# Altium PCB PCB-Thermostat.PcbDoc (part 1 of 4)
Units mil, origin at the board's own origin, x right, y up, seen from the top; angles counter-clockwise.
Board outline 3937.01 x 3543.31 mil, 4 copper layers (Top, PWR, GND, Bottom), stack 62.417 mil thick; 123 components, 131 nets, 527 pads, 279 vias.
Unrouted connection lines stored in the file: 2.
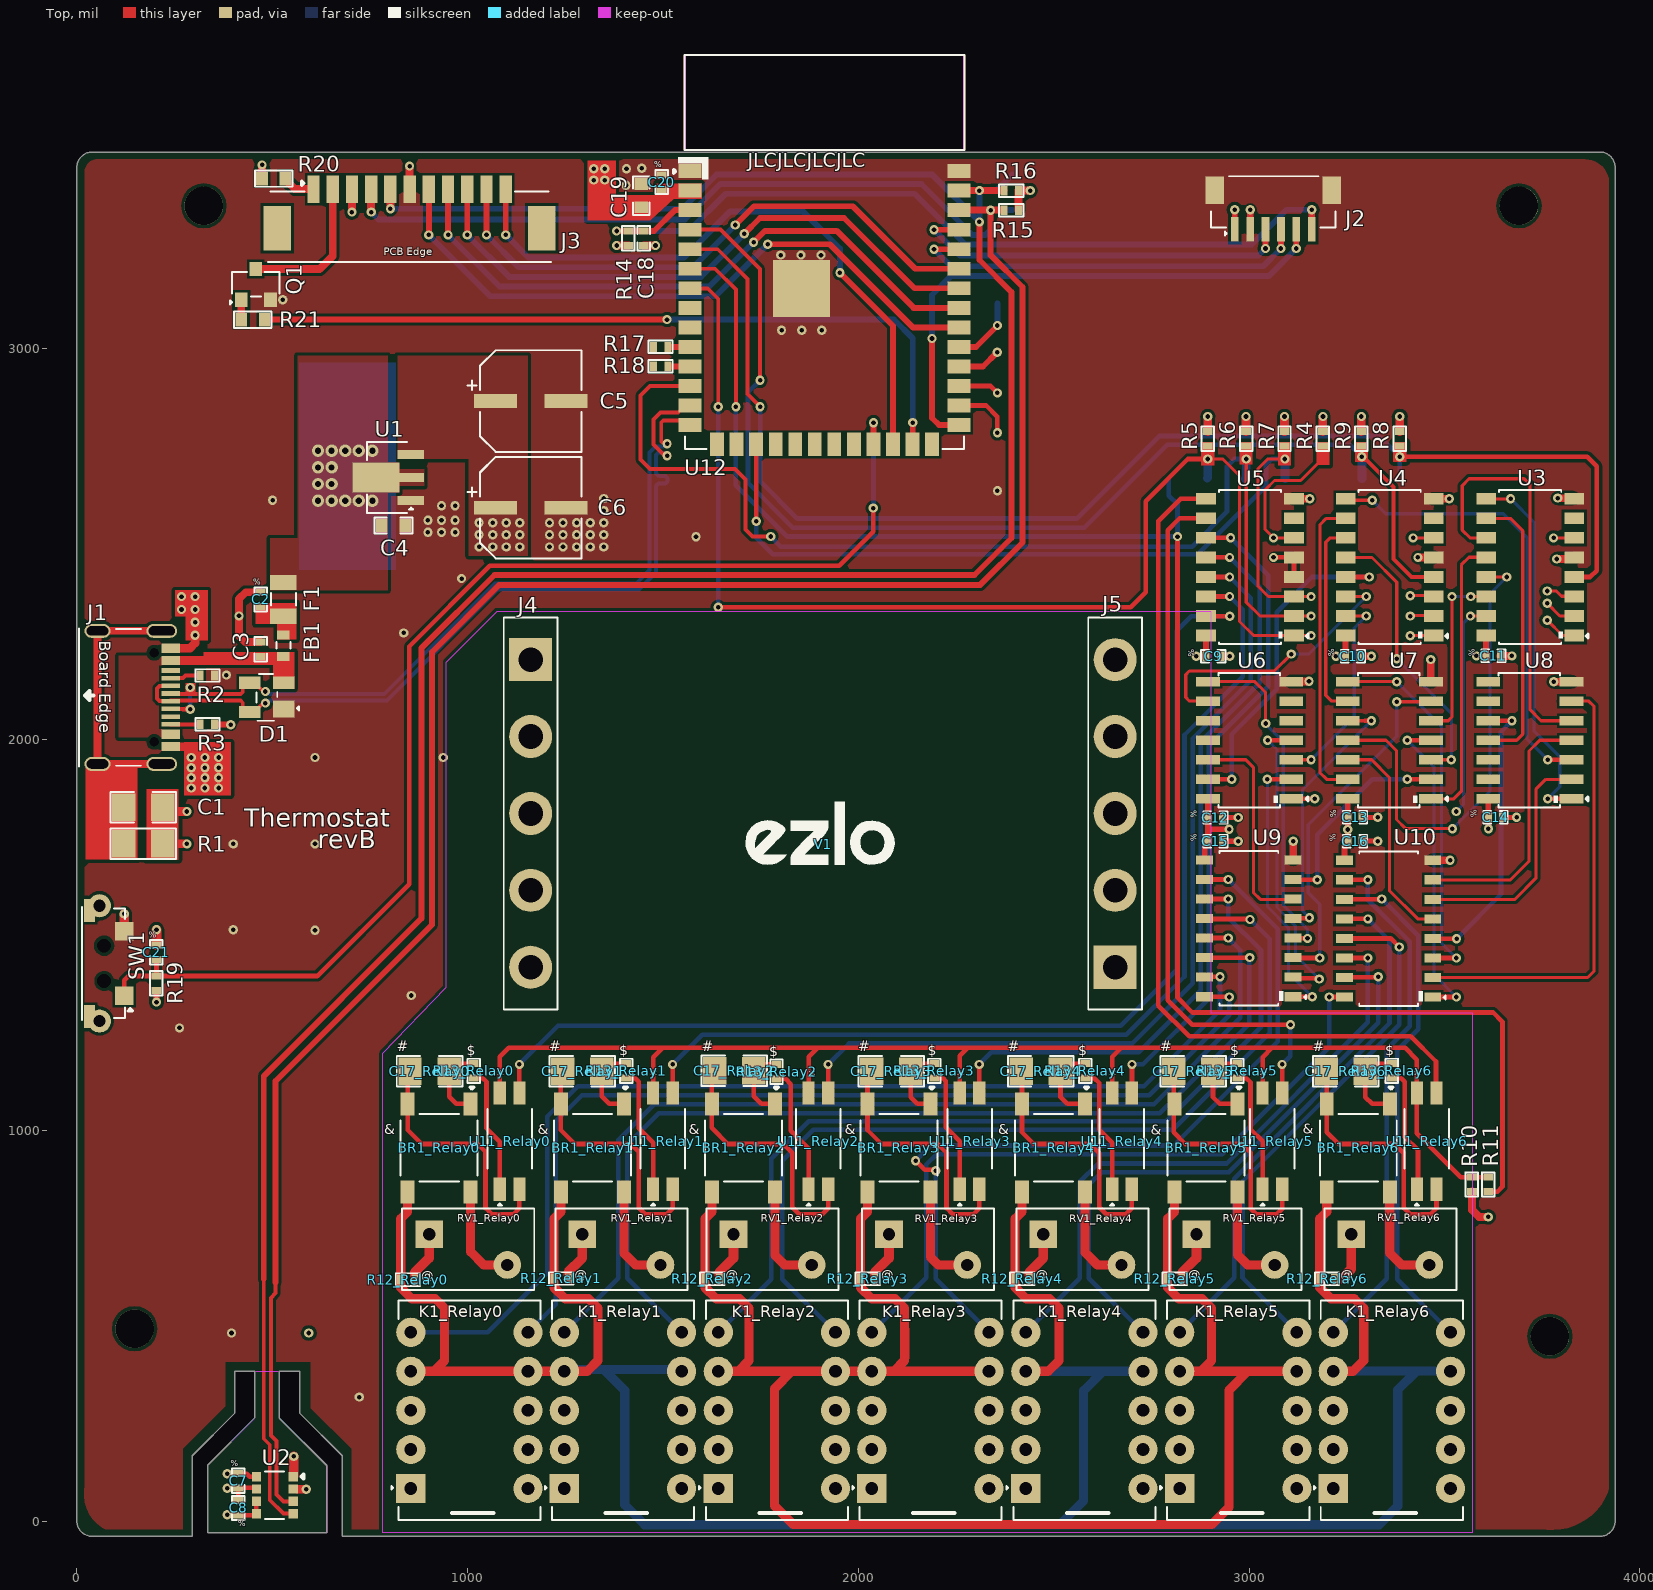
[diagram p0: Top view]
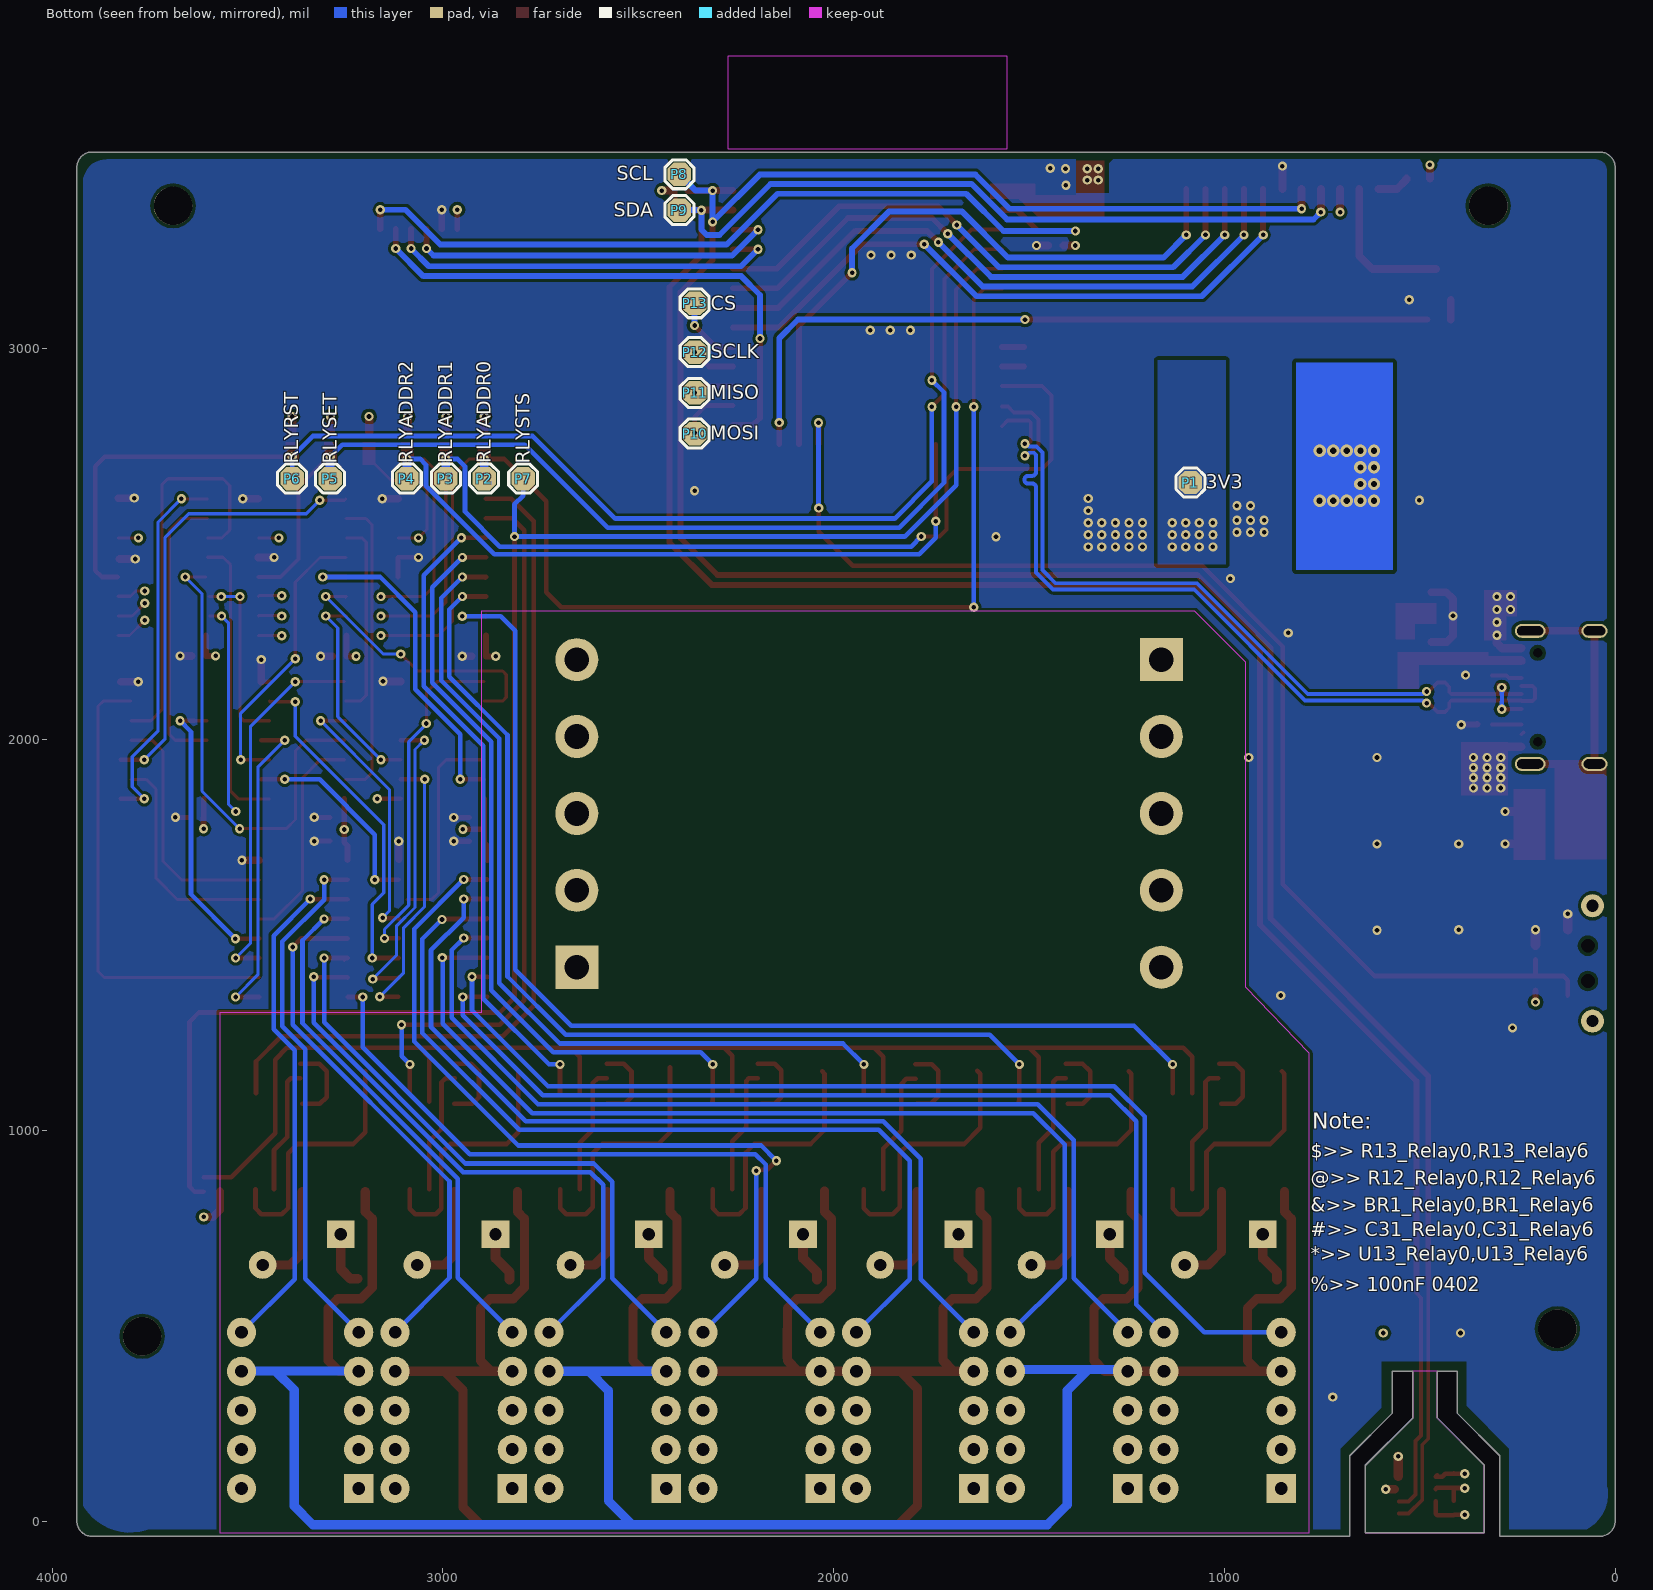
[diagram p1: Bottom view, seen from below]
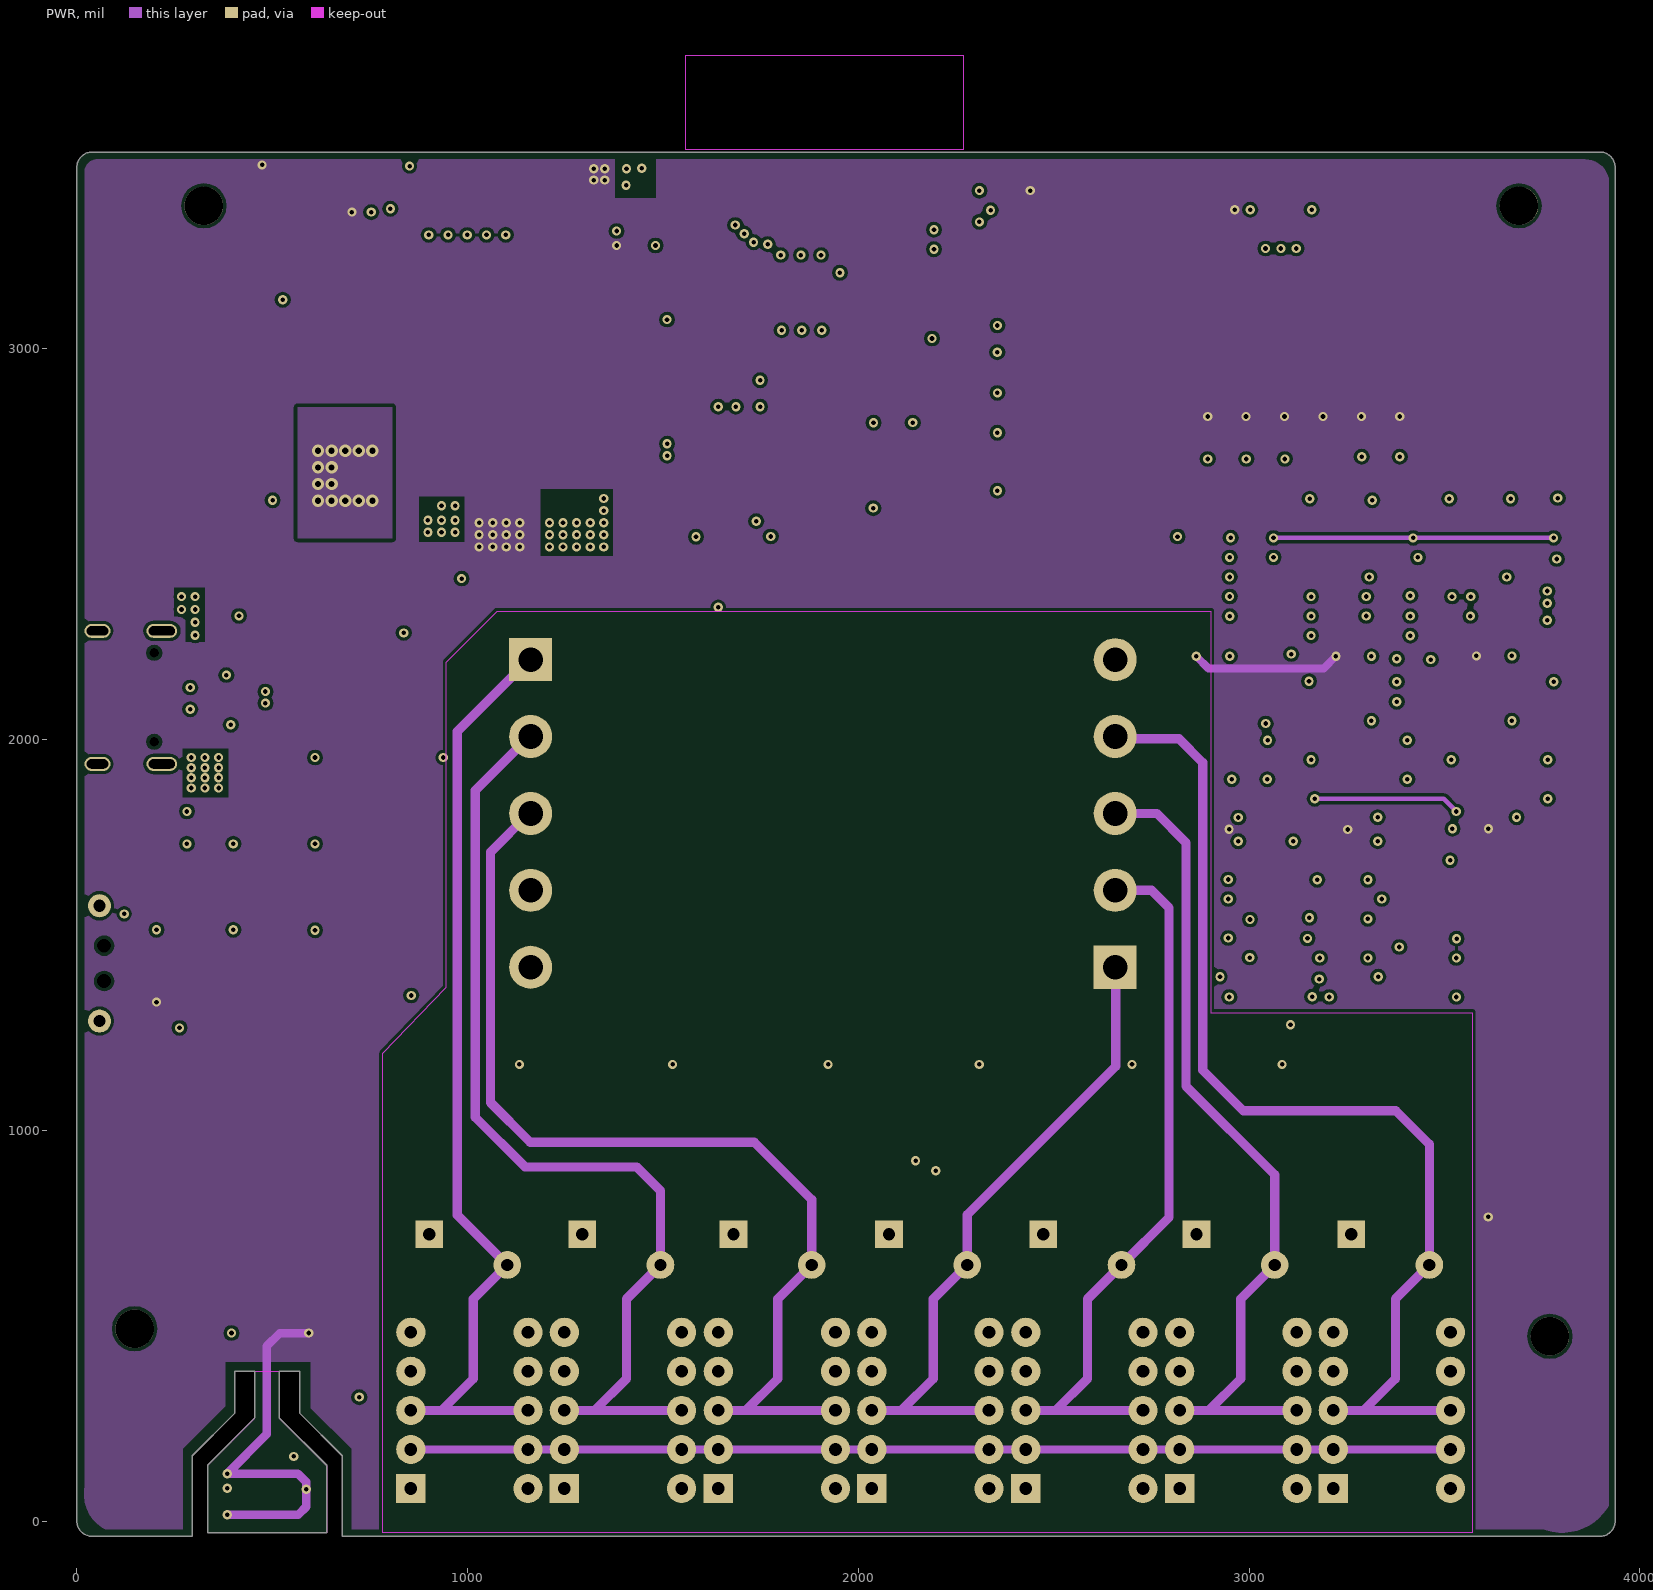
[diagram p2: PWR]
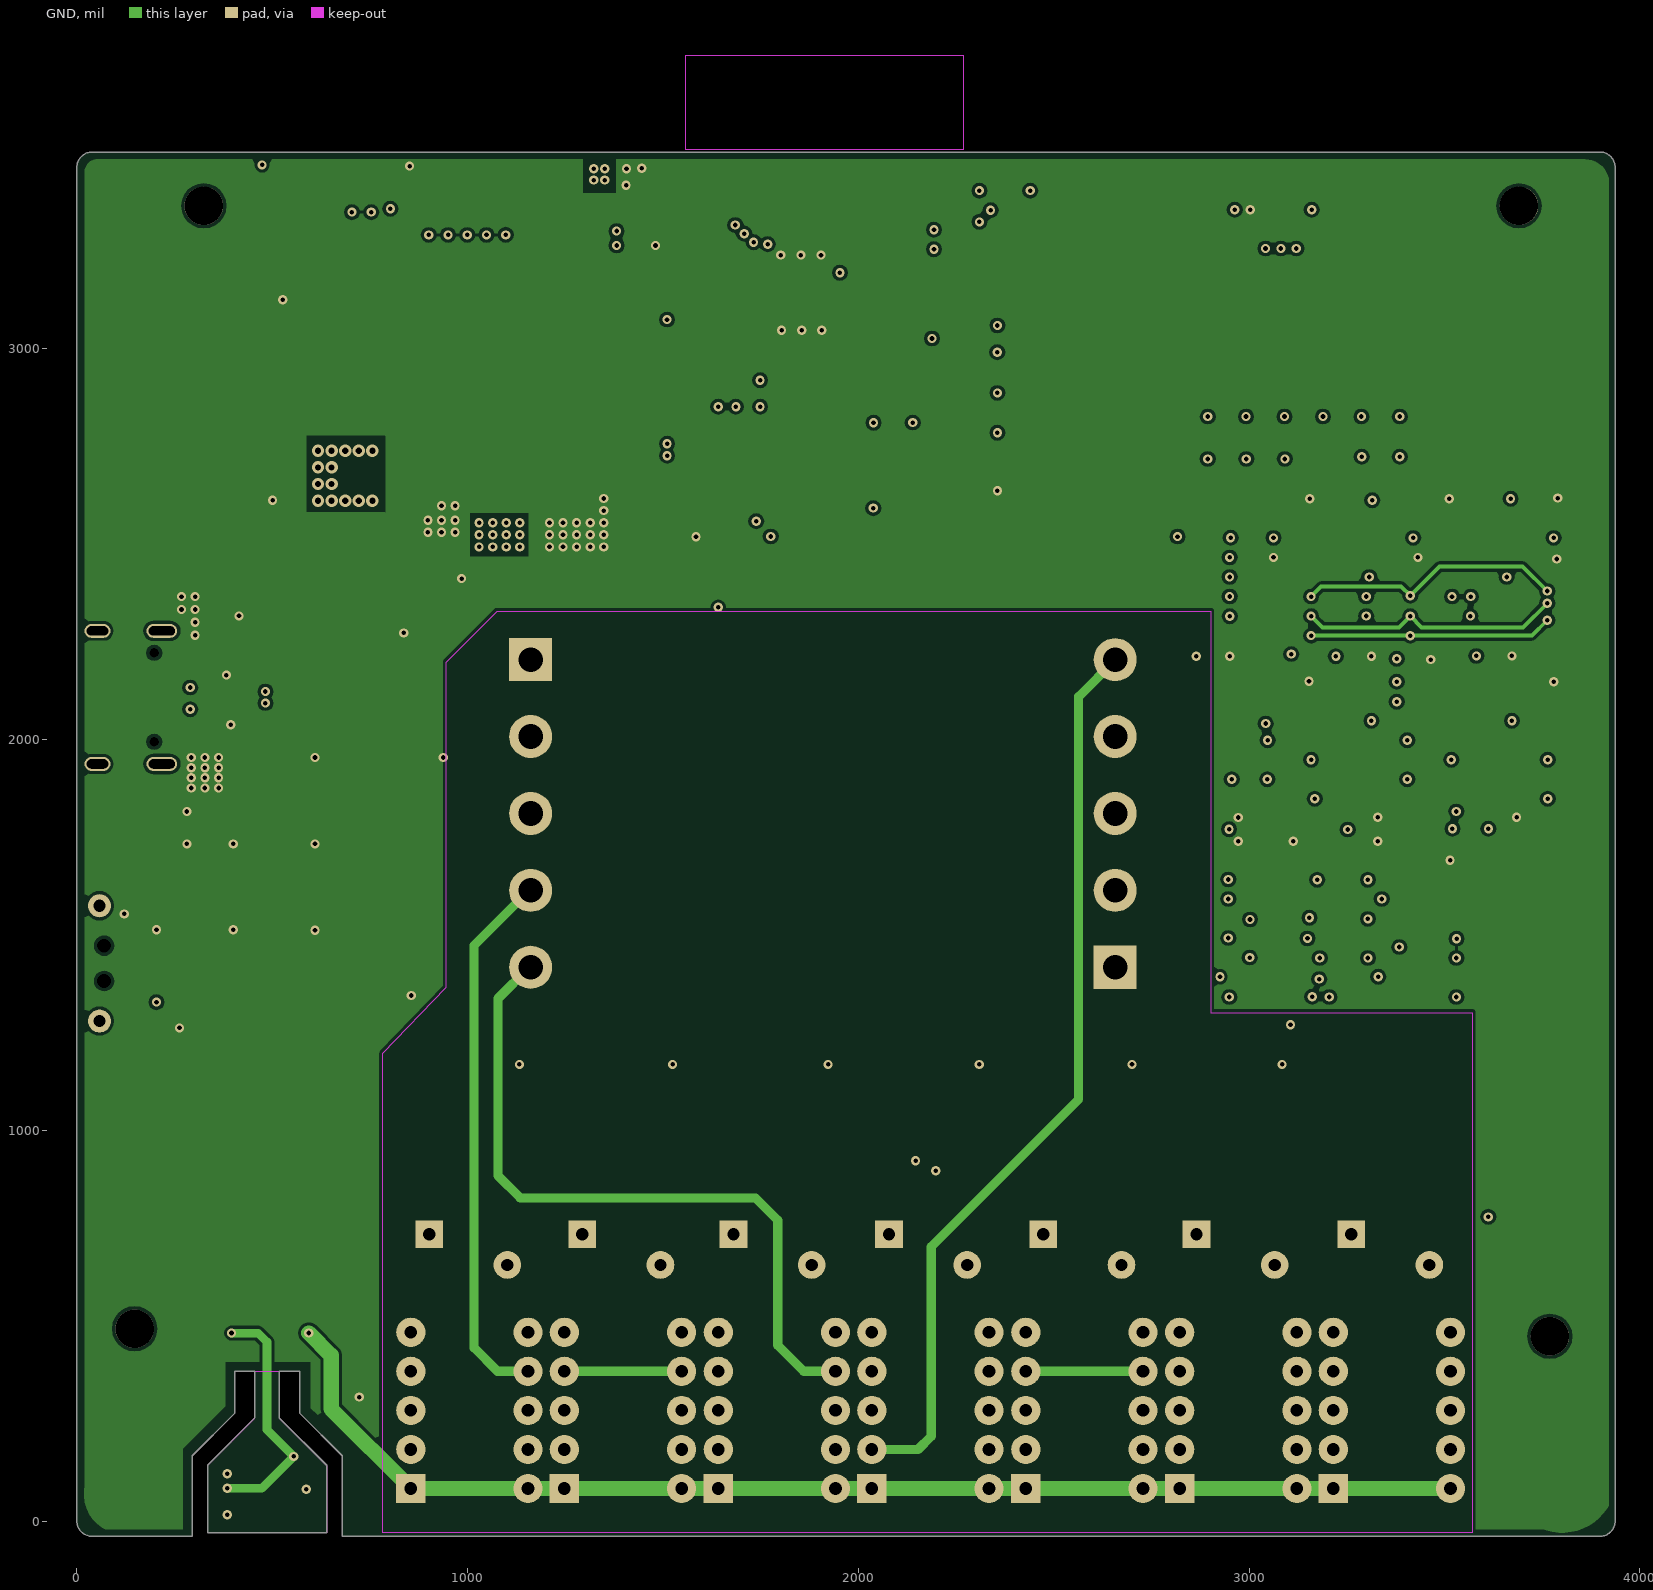
[diagram p3: GND]
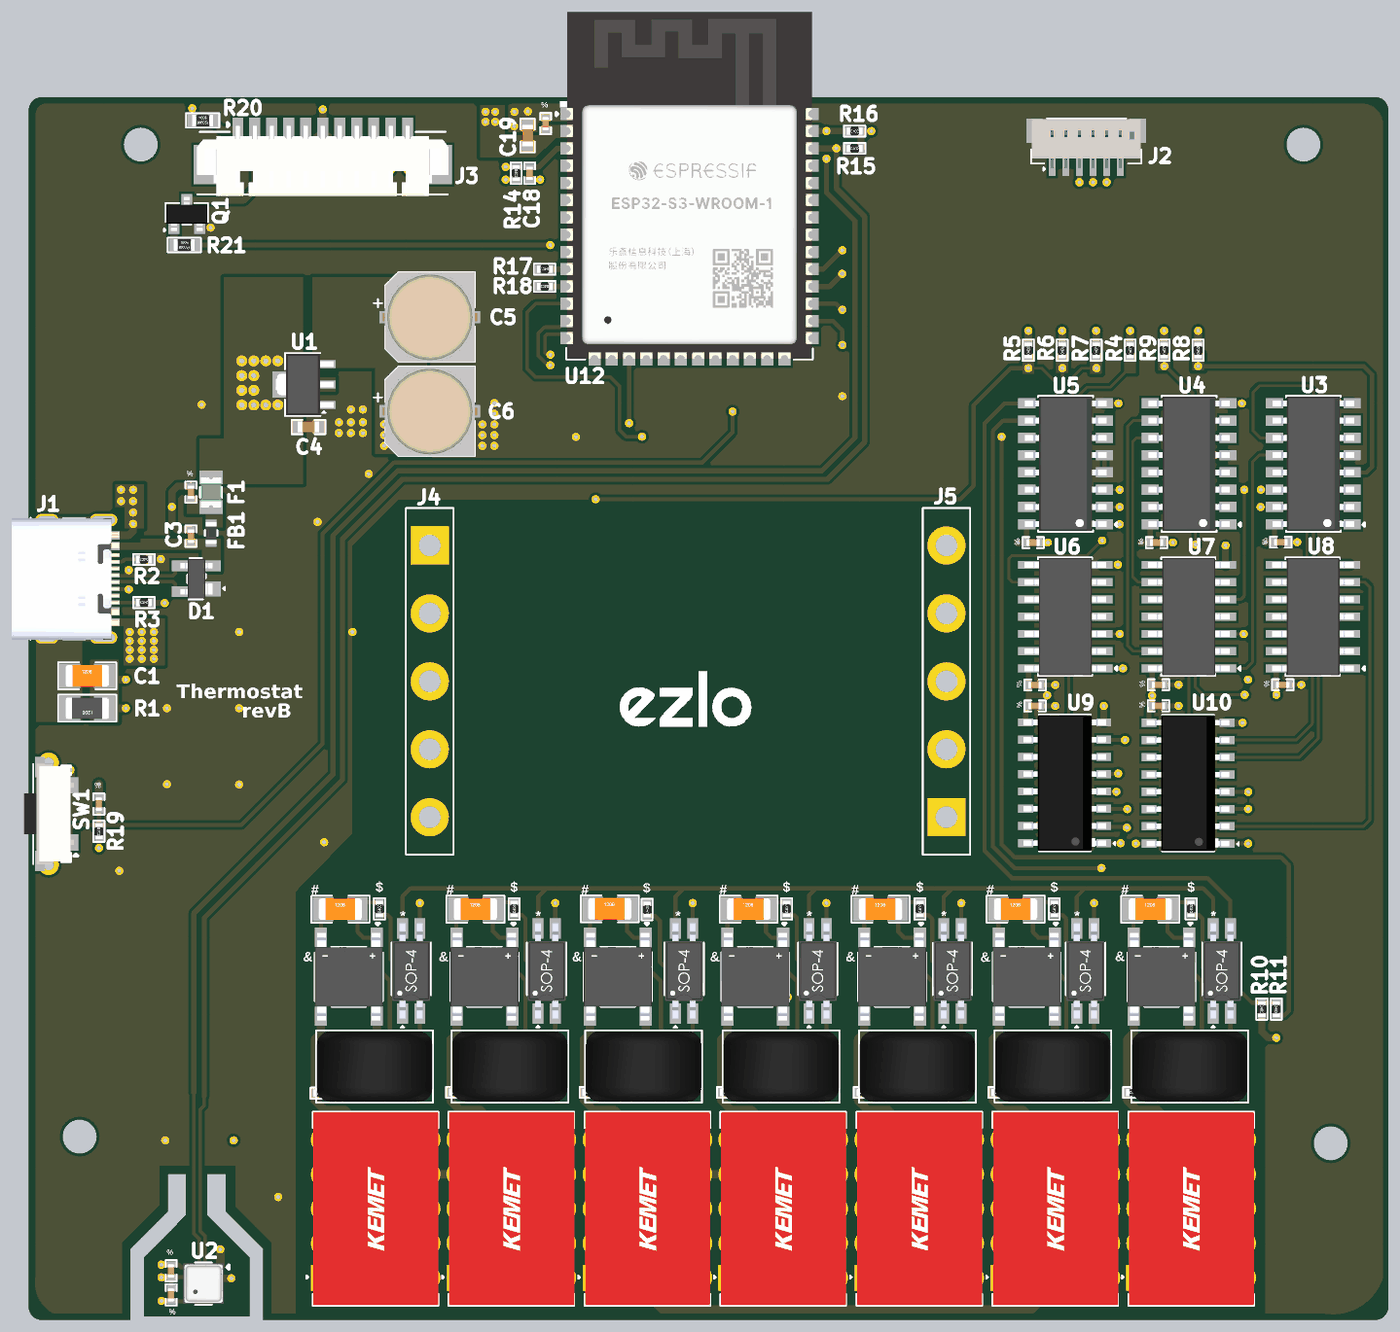
[diagram p6: 3D render of the assembled board from above, using the file's embedded part models]

## Layer stack, top to bottom
Top Solder: solder mask 0.3937, Solder Resist, Dk 3.3
Top: signal copper 1.378
Dielectric 4: core 8.2677, PP-006, Dk 4.6
PWR: signal copper 0.5984
Dielectric 1: prepreg 41.929, FR-4, Dk 4.6
GND: signal copper 0.5984
Dielectric 5: core 8.2677, PP-006, Dk 4.6
Bottom: signal copper 1.378
Bottom Solder: solder mask 0.3937, Solder Resist, Dk 3.3

## Board outline
0,0 ccw(c39.37,0) 39.37,-39.37 295.28,-39.37 295.28,167.32 403.54,275.59 403.54,383.86 454.72,383.86 454.72,263.78 334.65,142.72 334.65,-29.53 639.76,-29.53 639.76,142.72 517.72,263.78 517.72,383.86 570.87,383.86 570.87,275.59 679.13,167.32 679.13,-39.37 3897.64,-39.37 ccw(c3897.64,0) 3937.01,0 3937.01,3464.57 ccw(c3897.64,3464.57) 3897.64,3503.94 39.37,3503.94 ccw(c39.37,3464.57) 0,3464.57

## Design rules (kind name [scope] priority, off if disabled: settings)
Clearance [All] p1: gap=6 ignorepadtopadclearanceinfootprint=FALSE except(4: Arc-SMDPad Track-SMDPad SMDPad-SMDPad; 7: SMDPad-Fill SMDPad-Poly SMDPad-Region; 8: Arc-Fill Arc-Poly Arc-Region Track-Fill Track-Poly Track-Region THPad-Fill THPad-Poly THPad-Region Via-Fill Via-Poly Via-Region; 9.5: Fill-Fill Fill-Poly Fill-Region Poly-Poly Poly-Region Region-Region)
DiffPairsRouting [InDifferentialPairClass('USB_Lines')] p1: maxlimit=20 minlimit=6 mostfreqgap=20 toplayer_maxgap=6 toplayer_prefgap=6 toplayer_minwidth=10 toplayer_maxwidth=10 toplayer_prefwidth=10 midlayer1_mingap=20 midlayer1_minwidth=11 midlayer1_maxwidth=11 midlayer1_prefwidth=11 midlayer2_mingap=20 midlayer2_minwidth=11 midlayer2_maxwidth=11 midlayer2_prefwidth=11 bottomlayer_maxgap=6 bottomlayer_prefgap=6 bottomlayer_minwidth=10 bottomlayer_maxwidth=10 bottomlayer_prefwidth=10 impedanceprofiledriven=TRUE impedanceprofileid={9FB7C108-1303-4D36-9296-57A6E4422DFF} impedanceprofilevalue=90.000000 maxuncoupledlength=520
HoleSize [All] p1: absolutevalues=TRUE maxlimit=1000 minlimit=1 maxpercent=80.000 minpercent=20.000
HoleToHoleClearance [All] p1: gap=0 allowstackedmicrovias=TRUE
MatchedLengths "Schematic Matched Net Lengths" [InNetClass('USB')] p1: tolerance=50 checknetsindiffpair=TRUE checkdiffpairvsdiffpair=FALSE checkxsignals=FALSE checkothers=FALSE
MatchedLengths [InDifferentialPairClass('USB_Lines')] p2: tolerance=20 checknetsindiffpair=TRUE checkdiffpairvsdiffpair=FALSE checkxsignals=FALSE checkothers=FALSE
MaxMinImpedance "Schematic Impedance Constraint" [InNetClass('USB')] p1: minimum=85.00 maximum=90.00
MaxMinImpedance [All] p2: minimum=85.00 maximum=90.00
MinimumSolderMaskSliver [All] p1: minsoldermaskwidth=0
PlaneConnect [All] p1: planeconnectstyle=Direct reliefexpansion=20 reliefentries=4 reliefconductorwidth=10 reliefairgap=10
PolygonConnect [All] p1: connectstyle=Direct reliefconductorwidth=10 reliefentries=4 polygonreliefangle="90 Angle" airgapwidth=10
RoutingVias [All] p1: holewidth=11.81 width=23.62 viastyle="Through Hole" minholewidth=11.81 minwidth=23.62 maxholewidth=15.75 maxwidth=31.5
SilkToSilkClearance [All] p1: silktosilkclearance=0
SilkToSolderMaskClearance [IsPad] p1: minsilkscreentomaskgap=0 clearancetoexposedcopper=TRUE
SolderMaskExpansion [All] p1: expansion=0 istentingtop=FALSE soldermaskfromhole=TRUE
Width [All] p1: maxlimit=50 minlimit=7.87 preferedwidth=22 midlayer1_maxwidth=40 midlayer2_maxwidth=40 minimp=50.000000 maximp=50.000000 favimp=50.000000
23 further rules are at their usual default settings.

## Classes and differential pairs
component class U_TN-Display-Interfacing-Sheet: J2 Q1 R19 R21
differential pair class USB_Lines: USB
net class USB: USB_N USB_P
channel class Relay-Sheet: Relay0 Relay1 Relay2 Relay3 Relay4 Relay5 Relay6
component class U_Sensor-Sheet: C7 C8 U2
component class U_Power-Sheet: C1 C2 C3 C4 C5 C6 D1 F1 FB1 J1 P1 R1 R2 R3 U1
component class U_Output-Sheet: C3 C4 C10 C11 C12 C14 C15 C16 P1 P2 P3 P5 P7 R4 R5 R6 R7 R8 R9 R10 R11 U3 U4 U5 U6 U7 U8 U9 U10
component class U_ESP32-Sheet: C6 C7 C19 C20 J2 P5 P7 P9 P11 P13 R14 R15 R17 R19 SW1 U12
component class Relay6: BR1_Relay6 C17_Relay6 K1_Relay6 R12_Relay6 R13_Relay6 RV1_Relay6 U11_Relay6
component class Relay5: BR1_Relay5 C17_Relay5 K1_Relay5 R12_Relay5 R13_Relay5 RV1_Relay5 U11_Relay5
component class Relay4: BR1_Relay4 C17_Relay4 K1_Relay4 R12_Relay4 R13_Relay4 RV1_Relay4 U11_Relay4
component class Relay3: BR1_Relay3 C17_Relay3 K1_Relay3 R12_Relay3 R13_Relay3 RV1_Relay3 U11_Relay3
component class Relay2: BR1_Relay2 C17_Relay2 K1_Relay2 R12_Relay2 R13_Relay2 RV1_Relay2 U11_Relay2
component class Relay1: BR1_Relay1 C17_Relay1 K1_Relay1 R12_Relay1 R13_Relay1 RV1_Relay1 S U11_Relay1
component class Relay0: BR1_Relay0 C17_Relay0 K1_Relay0 R12_Relay0 R13_Relay0 RV1_Relay0 U11_Relay0
differential pair USB: +USB_P -USB_N

## Components (designator, comment, footprint, x,y, rotation, side; value= is the part's Value field where it differs from the comment)
BR1_Relay0 "ABS10" ABS 927.04,955.23 r270 top (schematic designator BR1)
BR1_Relay1 "ABS10" ABS 1319.75,955.23 r270 top (schematic designator BR1)
BR1_Relay2 "ABS10" ABS 1706.04,955.23 r270 top (schematic designator BR1)
BR1_Relay3 "ABS10" ABS 2104.04,955.23 r270 top (schematic designator BR1)
BR1_Relay4 "ABS10" ABS 2499.75,955.23 r270 top (schematic designator BR1)
BR1_Relay5 "ABS10" ABS 2890.04,955.23 r270 top (schematic designator BR1)
BR1_Relay6 "ABS10" ABS 3279.75,955.23 r270 top (schematic designator BR1)
C1 "4.7nF" Cap-1206 169.64,1827.13 r0 top locked
C2 "100nF" Cap-0402 470.08,2358.82 r90 top locked
C3 "0.01uF" Cap-0402 470.08,2231.46 r90 top locked
C4 "10uF" Cap-0603 810.24,2548 r0 top
C5 "100uF" UCD1A101MCL1GS 1161.66,2866.61 r0 top locked
C6 "100uF" UCD1A101MCL1GS 1161.66,2593.62 r0 top locked
C7 "100nF" Cap-0402 412.64,103.3 r270 top locked
C8 "100nF" Cap-0402 412.64,33.63 r90 top locked
C9 "100nF" Cap-0402 2908.44,2213.13 r0 top
C10 "100nF" Cap-0402 3265.79,2213.13 r0 top
C11 "100nF" Cap-0402 3625.45,2214.16 r0 top
C12 "100nF" Cap-0402 2913.95,1800.6 r0 top
C13 "100nF" Cap-0402 3271.31,1801.13 r0 top
C14 "100nF" Cap-0402 3630.95,1801.13 r0 top
C15 "100nF" Cap-0402 2913.95,1739.91 r0 top
C16 "100nF" Cap-0402 3271.31,1740.13 r0 top locked
C17_Relay0 "220nF" Cap-1206 902.64,1151.13 r0 top locked (schematic designator C17)
C17_Relay1 "220nF" Cap-1206 1293.64,1151.13 r0 top locked (schematic designator C17)
C17_Relay2 "220nF" Cap-1206 1682.64,1152.13 r0 top (schematic designator C17)
C17_Relay3 "220nF" Cap-1206 2084.64,1151.13 r0 top locked (schematic designator C17)
C17_Relay4 "220nF" Cap-1206 2466.64,1151.13 r0 top locked (schematic designator C17)
C17_Relay5 "220nF" Cap-1206 2857.64,1151.13 r0 top locked (schematic designator C17)
C17_Relay6 "220nF" Cap-1206 3247.64,1151.13 r0 top locked (schematic designator C17)
C18 "1uF" Cap-0402 1450.64,3283.13 r90 top locked
C19 "22uF" Cap-0603 1444.69,3392.25 r90 top locked
C20 "100nF" Cap-0402 1497,3427 r90 top
C21 "100nF" Cap-0402 203.64,1455.63 r90 top locked
D1 "SP0503BAHTG" SOT-143-4_ 529.13,2078.74 r180 top locked
F1 "JK-SMD0805-100" Fuse-0805 528.34,2358.82 r90 top locked
FB1 "BLM18SG121TN1D" "IND-0603 (1608 Metric)" 528.47,2240.51 r90 top locked
J1 "TYPE-C-31-M-12" TYPE-C-31-M-12_ 239.75,2234.09 r270 top locked
J2 "Voltlink Target" "Voltlink Target" 3062,3356.37 r0 top locked
J3 "1.25-11PWB" 1.25-11PWB 851.57,3358.8 r0 top locked
J4 "Clamp-Terminal-A" Clamp-Terminal-A 1161.42,2204.72 r270 top locked
J5 "Clamp-Terminal-B" Clamp-Terminal-B. 2657.48,1811.02 r90 top locked
K1_Relay0 "EA2-3TNU" EA2-3TNU 1004.64,283.13 r180 top (schematic designator K1)
K1_Relay1 "EA2-3TNU" EA2-3TNU 1397.64,283.13 r180 top (schematic designator K1)
K1_Relay2 "EA2-3TNU" EA2-3TNU 1791.64,283.13 r180 top (schematic designator K1)
K1_Relay3 "EA2-3TNU" EA2-3TNU 2184.64,283.13 r180 top (schematic designator K1)
K1_Relay4 "EA2-3TNU" EA2-3TNU 2578.64,283.13 r180 top (schematic designator K1)
K1_Relay5 "EA2-3TNU" EA2-3TNU 2972.64,283.13 r180 top (schematic designator K1)
K1_Relay6 "EA2-3TNU" EA2-3TNU 3365.64,283.13 r180 top (schematic designator K1)
P1 "TEST POINT" Test-point 1087,2658 r180 bottom locked
P2 "TEST POINT" Test-point 2894.64,2667.9 r180 bottom locked
P3 "TEST POINT" Test-point 2992.64,2667.9 r180 bottom locked
P4 "TEST POINT" Test-point 3092.64,2667.9 r180 bottom locked
P5 "TEST POINT" Test-point 3289.07,2667.9 r180 bottom locked
P6 "TEST POINT" Test-point 3386.07,2667.9 r180 bottom locked
P7 "TEST POINT" Test-point 2794.64,2667.9 r180 bottom locked
P8 "TEST POINT" Test-point 2395,3447 r90 bottom
P9 "TEST POINT" Test-point 2395,3355.13 r90 bottom
P10 "TEST POINT" Test-point 2355.65,2783.13 r0 bottom
P11 "TEST POINT" Test-point 2355.65,2887.4 r0 bottom
P12 "TEST POINT" Test-point 2355.65,2991.66 r0 bottom
P13 "TEST POINT" Test-point 2355.65,3116.64 r0 bottom
Q1 "MMBT2222A-7-F" SOT-23 458,3165 r0 top
R1 "1M" Res-1206 169.64,1733.13 r180 top locked
R2 "5.1K" Res-0402 334.14,2164.13 r180 top locked
R3 "5.1K" Res-0402 334.14,2039.13 r180 top locked
R4 "220K" Res-0402 3189.22,2769.97 r90 top locked
R5 "220K" Res-0402 2894.64,2769.97 r90 top locked
R6 "220K" Res-0402 2992.37,2769.97 r90 top locked
R7 "220K" Res-0402 3090.8,2769.97 r90 top locked
R8 "220K" Res-0402 3386.07,2769.97 r90 top locked
R9 "220K" Res-0402 3287.65,2769.97 r90 top locked
R10 "220K" Res-0402 3570.64,861.52 r270 top locked
R11 "47K" Res-0402 3612.45,861.52 r270 top locked
R12_Relay0 "47R" Res-0402 847.12,618.13 r180 top (schematic designator R12)
R12_Relay1 "47R" Res-0402 1239.83,620.76 r180 top (schematic designator R12)
R12_Relay2 "47R" Res-0402 1626.12,619.95 r180 top (schematic designator R12)
R12_Relay3 "47R" Res-0402 2024.12,620.13 r180 top (schematic designator R12)
R12_Relay4 "47R" Res-0402 2419.83,619.95 r180 top (schematic designator R12)
R12_Relay5 "47R" Res-0402 2810.12,619.95 r180 top (schematic designator R12)
R12_Relay6 "47R" Res-0402 3199.83,619.95 r180 top (schematic designator R12)
R13_Relay0 "100K" Res-0402 1015.64,1152.13 r90 top locked (schematic designator R13)
R13_Relay1 "100K" Res-0402 1405.64,1152.13 r90 top locked (schematic designator R13)
R13_Relay2 "100K" Res-0402 1790.64,1150.13 r90 top (schematic designator R13)
R13_Relay3 "100K" Res-0402 2194.64,1152.13 r90 top locked (schematic designator R13)
R13_Relay4 "100K" Res-0402 2580.64,1152.13 r90 top locked (schematic designator R13)
R13_Relay5 "100K" Res-0402 2969.64,1152.13 r90 top locked (schematic designator R13)
R13_Relay6 "100K" Res-0402 3365.64,1152.13 r90 top locked (schematic designator R13)
R14 "220K" Res-0402 1411.64,3283.13 r270 top locked
R15 "4.7K" Res-0402 2391.64,3355.12 r0 top locked
R16 "4.7K" Res-0402 2391.64,3405.12 r0 top locked
R17 "22R" Res-0402 1494.14,3005.12 r180 top locked
R18 "22R" Res-0402 1494.14,2955.12 r180 top locked
R19 "220K" Res-0402 203.64,1376.33 r270 top locked
R20 "33R" Res-0603 504,3436 r180 top
R21 "1K" Res-0603 450.6,3075 r180 top
RV1_Relay0 "ERZ-V07D680" ERZ-V07D680 1001.64,694.76 r0 top locked (schematic designator RV1)
RV1_Relay1 "ERZ-V07D680" ERZ-V07D680 1393.64,694.76 r0 top locked (schematic designator RV1)
RV1_Relay2 "ERZ-V07D680" ERZ-V07D680 1780.64,694.76 r0 top locked (schematic designator RV1)
RV1_Relay3 "ERZ-V07D680" ERZ-V07D680 2178.64,694.76 r0 top locked (schematic designator RV1)
RV1_Relay4 "ERZ-V07D680" ERZ-V07D680 2573.64,694.76 r0 top locked (schematic designator RV1)
RV1_Relay5 "ERZ-V07D680" ERZ-V07D680 2965.64,694.76 r0 top locked (schematic designator RV1)
RV1_Relay6 "ERZ-V07D680" ERZ-V07D680 3361.64,694.76 r0 top locked (schematic designator RV1)
SW1 "YTS-B003-2A" YTS-B003-2A 76.64,1427.2 r90 top locked
U1 "LR1107G-33-AB3-C-R" SOT-89-3 810.24,2671.01 r90 top locked
U2 "BME680" BME680 506.64,66.13 r0 top locked
U3 "74LVC138AD,118" 16-SOIC 3832.14,2266.29 r180 top locked
U4 "74LVC138AD,118" 16-SOIC 3472.49,2266.29 r180 top locked
U5 "74LVC138AD,118" 16-SOIC 3115.14,2266.29 r180 top locked
U6 "SN74LV14AD" 14-SOIC 3001.75,1998.38 r180 top locked
U7 "SN74LV14AD" 14-SOIC 3359.1,1998.38 r180 top locked
U8 "SN74LV14AD" 14-SOIC 3718.75,1998.38 r180 top locked
U9 "ULN2003A" SOP-16_150mil 2999.78,1517.09 r180 top locked
U10 "ULN2003A" SOP-16_150mil 3357.14,1516.09 r180 top locked
U11_Relay0 "OR-3H7B-TP-G" "SOP-4-1.27mm pitch Body 2.6mm" 1107.64,972.16 r90 top (schematic designator U11)
U11_Relay1 "OR-3H7B-TP-G" "SOP-4-1.27mm pitch Body 2.6mm" 1499.75,972.16 r90 top (schematic designator U11)
U11_Relay2 "OR-3H7B-TP-G" "SOP-4-1.27mm pitch Body 2.6mm" 1897.75,972.16 r90 top (schematic designator U11)
U11_Relay3 "OR-3H7B-TP-G" "SOP-4-1.27mm pitch Body 2.6mm" 2284.75,972.16 r90 top (schematic designator U11)
U11_Relay4 "OR-3H7B-TP-G" "SOP-4-1.27mm pitch Body 2.6mm" 2674.75,972.16 r90 top (schematic designator U11)
U11_Relay5 "OR-3H7B-TP-G" "SOP-4-1.27mm pitch Body 2.6mm" 3059.75,972.16 r90 top (schematic designator U11)
U11_Relay6 "OR-3H7B-TP-G" "SOP-4-1.27mm pitch Body 2.6mm" 3454.75,972.16 r90 top (schematic designator U11)
U12 "ESP32-S3-WROOM-1-N8" "41-SMD Module" 1913.39,3105.51 r0 top locked
V1 "EZLO_LOGO" "Logo Ezlo_M" 1909.7,1732.63 r0 top locked

## Footprints (in the part's own frame and the unit in brackets; to place one, negate y for a bottom-side part, rotate by r counter-clockwise, add the part's x,y. Pads: shape width x height; smd on the part's side, far side on the other; paste and mask are expansions set on the pad)
1.25-11PWB [mm]
  rect 0.8x1.8 smd: 1(-6.25,1.275) 2(-5,1.275) 3(-3.75,1.275) 4(-2.5,1.275) 5(-1.25,1.275) 6(0,1.275) 7(1.25,1.275) 8(2.5,1.275) 9(3.75,1.275) 10(5,1.275) 11(6.25,1.275)
  rect 1.8x2.9 smd: MP1(-8.6,-1.275) MP2(8.6,-1.275)
  silkscreen extent -9.22,-3.47 9.19,1.78, body extent -9.26,-3.61 9.25,1.59, height 3.5
14-SOIC [mm]
  rect 1.55x0.6 smd: 1(-2.7,3.81) 2(-2.7,2.54) 3(-2.7,1.27) 4(-2.7,0) 5(-2.7,-1.27) 6(-2.7,-2.54) 7(-2.7,-3.81) 8(2.7,-3.81) 9(2.7,-2.54) 10(2.7,-1.27) 11(2.7,0) 12(2.7,1.27) 13(2.7,2.54) 14(2.7,3.81)
  silkscreen extent -3.78,-4.37 2.03,4.37, body extent -3,-4.33 3,4.33, height 1.75
16-SOIC [mm]
  rect 1.27x0.76 smd: 1(0,0) 2(0,-1.27) 3(0,-2.54) 4(0,-3.81) 5(0,-5.08) 6(0,-6.35) 7(0,-7.62) 8(0,-8.89) 9(5.72,-8.89) 10(5.72,-7.62) 11(5.72,-6.35) 12(5.72,-5.08) 13(5.72,-3.81) 14(5.72,-2.54) 15(5.72,-1.27) 16(5.72,0)
  silkscreen extent -0.91,-9.45 4.88,0.56, body extent -0.14,-9.4 5.86,0.51, height 1.75
"41-SMD Module" [mm]
  rect 1.5x0.9 smd: 1(-8.75,8.88) 2(-8.75,7.61) 3(-8.75,6.34) 4(-8.75,5.07) 5(-8.75,3.8) 6(-8.75,2.53) 7(-8.75,1.26) 8(-8.75,-0.01) 9(-8.75,-1.28) 10(-8.75,-2.55) 11(-8.75,-3.82) 12(-8.75,-5.09) 13(-8.75,-6.36) 14(-8.75,-7.63) 27(8.75,-7.63) 28(8.75,-6.36) 29(8.75,-5.09) 30(8.75,-3.82) 31(8.75,-2.55) 32(8.75,-1.28) 33(8.75,-0.01) 34(8.75,1.26) 35(8.75,2.53) 36(8.75,3.8) 37(8.75,5.07) 38(8.75,6.34) 39(8.75,7.61) 40(8.75,8.88)
  rect 0.9x1.5 smd: 15(-6.98,-8.88) 16(-5.71,-8.88) 17(-4.44,-8.88) 18(-3.17,-8.88) 19(-1.9,-8.88) 20(-0.63,-8.88) 21(0.64,-8.88) 22(1.91,-8.88) 23(3.18,-8.88) 24(4.45,-8.88) 25(5.72,-8.88) 26(6.99,-8.88)
  rect 3.7x3.7 smd: 41(-1.5,1.26)
  Keep-Out Layer region: -9.042,10.287 9.042,10.287 9.042,16.383 -9.042,16.383
  silkscreen extent -9.8,-9.2 9.09,16.43, body extent -9.01,-9.14 9.01,16.37, height 3.16
ABS [mm]
  rect 1.5x0.9 smd: 1(-2.86,2.05) 2(-2.86,-2.05) 3(2.86,-2.05) 4(2.86,2.05)
  silkscreen extent -3.94,-2.5 2.2,2.5, body extent -3.22,-2.5 3.22,2.5, height 1.6
BME680 [mm]
  rect 0.6x0.6 smd: 1(1.2,1.2) 2(1.2,0.4) 3(1.2,-0.4) 4(1.2,-1.2) 5(-1.2,-1.2) 6(-1.2,-0.4) 7(-1.2,0.4) 8(-1.2,1.2)
  silkscreen extent -0.64,-1.55 1.85,1.55, body extent -1.5,-1.5 1.5,1.5, height 1
Cap-0402 [mil]
  rect 18x25 smd mask+2.36: 1(-18.5,0) 2(18.5,0)
  silkscreen extent -31,-16 31,16, body extent -20,-10 20,10, height 19
Cap-0603 [mil]
  rect 30x35 smd mask+2.36: 1(-30,0) 2(30,0)
  silkscreen extent -49,-21 49,21, body extent -32,-16 31,16, height 34
Cap-1206 [mil] "SMD 1206"
  rect 60x70 smd: 1(-50,0) 2(50,0)
  silkscreen extent -84,-39 84,39, body extent -63,-31 63,32, height 39
Clamp-Terminal-A [mm]
  rect 2.8x2.8 hole 1.6: 1(0,0)
  round 2.8 hole 1.6: 2(5,0) 3(10,0) 4(15,0) 5(20,0)
  silkscreen extent -2.75,-1.75 22.75,1.75
Clamp-Terminal-B. [mm]
  rect 2.8x2.8 hole 1.6: 1(-10,0)
  round 2.8 hole 1.6: 2(-5,0) 3(0,0) 4(5,0) 5(10,0)
  silkscreen extent -12.75,-1.75 12.75,1.75
EA2-3TNU [mm]
  rect 1.9x1.9 hole 0.82: 1(3.81,5.08)
  round 1.9 hole 0.82: 2(3.81,2.54) 3(3.81,0) 4(3.81,-2.54) 5(3.81,-5.08) 6(-3.81,-5.08) 7(-3.81,-2.54) 8(-3.81,0) 9(-3.81,2.54) 10(-3.81,5.08)
  silkscreen extent -4.62,-7.14 5.08,7.14, body extent -4.63,-7.1 4.57,7.1, height 5.05
ERZ-V07D680 [mm]
  rect 1.8x1.8 hole 0.8: 1(-2.54,1)
  round 1.8 hole 0.8: 2(2.54,-1)
  silkscreen extent -4.29,-2.64 4.29,2.67, body extent -4.25,-2.59 4.25,2.61, height 13.25
Fuse-0805 [mm]
  rect 1x1.7 smd: 1(-1.1,0) 2(1.1,0)
  silkscreen extent -0.41,-0.81 0.41,0.81, body extent -1.1,-0.75 1.1,0.75, height 1.24
"IND-0603 (1608 Metric)" [mm] "0.063\" L x 0.032\" W (1.60mm x 0.80mm)"
  rect 0.6x0.8 smd: 1(-0.7,0) 2(0.7,0)
  silkscreen extent -0.2,-0.46 0.23,0.46, body extent -0.8,-0.4 0.8,0.4, height 0.78
"Logo Ezlo_M" [mil]
  silkscreen extent -198,-53 183,108
Res-0402 [mil]
  rect 18x25 smd mask+2.17: 1(-18.5,0) 2(18.5,0)
  silkscreen extent -32,-17 32,16, body extent -23,-11 23,11, height 16
Res-0603 [mil]
  rect 30x35 smd: 1(-30,0) 2(30,0)
  silkscreen extent -48,-21 48,21, body extent -31,-17 31,17, height 18
Res-1206 [mil]
  rect 60x70 smd: 1(-50,0) 2(50,0)
  silkscreen extent -84,-39 84,39, body extent -63,-31 63,32, height 39
"SOP-4-1.27mm pitch Body 2.6mm" [mm]
  rect 1.5x0.8 smd: 1(-3.125,0.635) 2(-3.125,-0.635) 3(3.125,-0.635) 4(3.125,0.635) 4(3.125,0.635)
  silkscreen extent -4.17,-1.45 2.08,1.45, body extent -3.5,-1.4 3.5,1.4, height 2.1
SOP-16_150mil [mm]
  rect 1.1x0.6 smd: 1(-2.875,4.445) 2(-2.875,3.175) 3(-2.875,1.905) 4(-2.875,0.635) 5(-2.875,-0.635) 6(-2.875,-1.905) 7(-2.875,-3.175) 8(-2.875,-4.445) 9(2.875,-4.445) 10(2.875,-3.175) 11(2.875,-1.905) 12(2.875,-0.635) 13(2.875,0.635) 14(2.875,1.905) 15(2.875,3.175) 16(2.875,4.445)
  silkscreen extent -3.71,-5.03 1.91,5.03, body extent -3.04,-5 3.04,5, height 1.62
SOT-23 [mm] "TRANS NPN 40V 0.6A SOT23"
  rect 0.82x0.92 smd: 1(-0.95,-1) 2(0.95,-1) 3(0,1)
  silkscreen extent -1.68,-1.3 1.55,0.81, body extent -1.5,-1.25 1.5,1.25, height 1.05
SOT-89-3 [mm]
  rect 0.58x1.73 smd: 1(-1.5,-1.132) 2(0,-1.132) 3(1.5,-1.132)
  rect 1.933x3.03 smd: 2(0,1.132)
  silkscreen extent -2.31,-1.27 2.31,1.73, body extent -2.25,-1.84 2.25,2.41, height 1.54
SOT-143-4_ [mm]
  rect 1.4x1.1 smd: 1(0,0)
  rect 1.4x0.8 smd: 2(0,-1.7) 3(2.2,-1.7) 4(2.2,0.2)
  silkscreen extent -0.99,-2.27 1.76,0.77, body extent -0.08,-2.21 2.29,0.71, height 1.22
Test-point [mil]
  oct 60x60 smd: 1(0,0)
  silkscreen extent -37,-37 37,37
TYPE-C-31-M-12_ [mm]
  rect 0.6x1.2 smd: A1/B12(0,0) A4/B9(0.8,0) B1/A12(6.4,0) B4/A9(5.6,0)
  rect 0.3x1.2 smd: A5(1.95,0) A6(2.95,0) A7(3.45,0) A8(4.45,0) B5(4.95,0) B6(3.95,0) B7(2.45,0) B8(1.45,0)
  round 0 hole 0.62 unplated: MH(0.31,-1.07) MH(6.09,-1.07)
  oval 0.9x2 hole 0.6 slot 1.7 at 90 deg: S1(7.525,-0.57) S4(-1.125,-0.57)
  oval 0.9x1.7 hole 0.6 slot 1.4 at 90 deg: S2(7.525,-4.75) S3(-1.125,-4.75)
  silkscreen extent -1.3,-5.94 7.7,-1.93, body extent -1.27,-7.32 7.67,0.58, height 3.31
UCD1A101MCL1GS [mm]
  rect 2.8x0.9 smd: 1(-2.3,0) 2(2.3,0)
  silkscreen extent -4.12,-3.3 3.3,3.3, body extent -3.5,-3.32 3.5,3.28, height 5.8
"Voltlink Target" [mm]
  rect 0.5x1.6 smd: 1(-2.5,-1.262) 2(-1.5,-1.262) 3(-0.5,-1.262) 4(0.5,-1.262) 5(1.5,-1.262) 6(2.5,-1.262)
  rect 1.2x1.8 smd: MP1(-3.8,1.262) MP2(3.8,1.262)
  silkscreen extent -4.06,-1.68 4.06,2.17, body extent -4,-1.49 4,2.11, height 4.25
YTS-B003-2A [mm]
  rect 1.2x1.2 smd: 1(-2.1,-1.125) 2(2.1,-1.125)
  rect 1.5x0.7 smd: 3(3.45,1.125) 4(-3.45,1.125)
  round 1.5 hole 0.8: 5(3.75,0.475) 6(-3.75,0.475)
  round 0 hole 0.9 unplated: MH0(-1.15,0.175) MH1(1.15,0.175)
  silkscreen extent -3.68,-1.68 3.66,1.6, body extent -3.7,-1.37 3.7,2.36, height 3.59

## Part data
BR1_Relay0 BR1_Relay1 BR1_Relay2 BR1_Relay3 BR1_Relay4 BR1_Relay5 BR1_Relay6: "5uA@1kV 1V@0.4A 1A 1kV -55℃~+150℃@(Tj) ABS Bridge Rectifiers ROHS", LCSC Part Number=C3014049, Manufacturer=FOSAN, Package=ABS, ComponentLink1Description=LCSC, ComponentLink1URL=https://www.lcsc.com/product-detail/Bridge-Rectifiers_FOSAN-ABS10_C3014049.html, Item Type="Bridge Rectifier", Manufacturer Part Number=ABS10
C1: library part CC1206GRNPO9BN472, "CAP CER 4700PF 50V C0G/NPO 1206", Case Code (Imperial)=1206, Case Code (Metric)=3216, Dielectric=C0G, Manufacturer=Yageo, Max Operating Temperature=125°C, Min Operating Temperature=-55°C, Package Quantity=4000, Resistor Type=Ceramic, Supplier Part Number 1=603-C1206GRNPO9BN472, Tolerance=2%, Voltage Rating=50V, Capacitance=4.7nF, Case/Package=1206, Category="Ceramic Capacitors", ComponentLink1Description=https://datasheet.ciiva.com/11587/upy-gp-np0-16v-to-50v-8-11587271.pdf?src-supplier=Avnet, ComponentLink1URL=https://datasheet.ciiva.com/11587/upy-gp-np0-16v-to-50v-8-11587271.pdf?src-supplier=Avnet, ComponentLink2Description=https://datasheet.ciiva.com/13386/upy-gp-np0-16v-to-50v-8-13386316.pdf?src-supplier=Mouser, ComponentLink2URL=https://datasheet.ciiva.com/13386/upy-gp-np0-16v-to-50v-8-13386316.pdf?src-supplier=Mouser, Depth=1.6mm, Height=0.85mm, Length=3.2mm, Manufacturer Part Number=CC1206GRNPO9BN472, Mount="Surface Mount", Packaging="Tape and Reel", Pricing 1="1=0.41000, 10=0.28600, 50=0.28600, 100=0.17200, 1000=0.10900, 10000=0.09100 (USD)", Radiation Hardening=No, RoHS=Yes, RoHS Compliant=Yes, Series=CC, Supplier 1=Mouser, Termination=SMD/SMT, Thickness=0.037inch, Voltage Rating (DC)=50V, Width=0.063inch
C2 C7 C8 C9 C10 C11 C12 C13 C14 C15 C16 C20 C21: library part CC0402KRX5R8BB104, "CAP CER 0.1UF 25V X5R 0402", Case Code (Imperial)=0402, Case Code (Metric)=1005, Dielectric=X5R, LCSC Part Number=C106256, Manufacturer=Yageo, Max Operating Temperature=85°C, Min Operating Temperature=-55°C, Resistor Type=Ceramic, Supplier Part Number 1=311-1697-1-ND, Tolerance=10%, Voltage Rating=25V, Capacitance=100nF, Case/Package=0402, Category="Ceramic Capacitors", ComponentLink1Description=http://www.mouser.com/ds/2/447/UPY-GPHC_X5R_4V-to-50V_25-1131599.pdf?src-supplier=Mouser, ComponentLink1URL=http://www.mouser.com/ds/2/447/UPY-GPHC_X5R_4V-to-50V_25-1131599.pdf?src-supplier=Mouser, ComponentLink2Description=http://www.yageo.com/documents/recent/UPY-GPHC_X5R_4V-to-50V-16.pdf?src-supplier=Future+Electronics, ComponentLink2URL=http://www.yageo.com/documents/recent/UPY-GPHC_X5R_4V-to-50V-16.pdf?src-supplier=Future+Electronics, ComponentLink3Description=http://www.yageo.com/documents/recent/UPY-GPHC_X5R_4V-to-50V_25.pdf?src-supplier=Digi-Key, ComponentLink3URL=http://www.yageo.com/documents/recent/UPY-GPHC_X5R_4V-to-50V_25.pdf?src-supplier=Digi-Key, Depth=0.5mm, Halogen Free="Halogen Free", Item Type=Capacitor, Lead Free="Lead Free", Length=0.039inch, Manufacturer Part Number=CC0402KRX5R8BB104, Mount="Surface Mount", Packaging="Tape and Reel", Pricing 1="1=0.10000, 10=0.03800, 50=0.02100, 100=0.01710, 500=0.01224, 1000=0.00961, 2500=0.00874, 5000=0.00804 (USD)", RoHS=Yes, RoHS Compliant=Yes, Series=CC, Stock 1=4598218, Supplier 1=Digi-Key, Thickness=0.022inch, Voltage Rating (DC)=25V, Width=0.02inch
C3: library part CC0402KRX5R8BB103, "CAP CER 10000PF 25V X5R 0402", LCSC Part Number=C576726, Manufacturer=Yageo, Supplier Part Number 1=2101932, Category="Ceramic Capacitors", ComponentLink1Description=LCSC, ComponentLink1URL=https://www.lcsc.com/product-detail/Multilayer-Ceramic-Capacitors-MLCC-SMD-SMT_YAGEO-CC0402KRX5R8BB103_C576726.html, Item Type=Capacitor, Manufacturer Part Number=CC0402KRX5R8BB103, Pricing 1="10000=0.00290, 40000=0.00270, 150000=0.00260, 250000=0.00250, 500000=0.00240 (USD)", RoHS=Yes, RoHS Compliant=Yes, Stock 1=140000, Supplier 1="Future Electronics"
C4: library part CC0603KRX5R7BB106, "CAP CER 10UF 16V X5R 0603", Case Code (Imperial)=0603, Case Code (Metric)=1608, LCSC Part Number=C2936601, Manufacturer=Yageo, Max Operating Temperature=85°C, Min Operating Temperature=-55°C, Supplier Part Number 1=311-3486-1-ND, Tolerance=10%, Voltage Rating=16V, Capacitance=10uF, Case/Package=0603, Category="Ceramic Capacitors", ComponentLink1Description=http://www.yageo.com/documents/recent/UPY-GPHC_X5R_4V-to-50V_25.pdf?src-supplier=Digi-Key, ComponentLink1URL=http://www.yageo.com/documents/recent/UPY-GPHC_X5R_4V-to-50V_25.pdf?src-supplier=Digi-Key, Item Type=Capacitor, Manufacturer Part Number=CC0603KRX5R7BB106, Mount="Surface Mount", Packaging="Cut Tape", Pricing 1="1=0.68000, 10=0.48000, 50=0.36300, 100=0.31610, 500=0.23416, 1000=0.19903 (USD)", RoHS=Yes, RoHS Compliant=Yes, Stock 1=240725, Supplier 1=Digi-Key
C5 C6: library part UCD1A101MCL1GS, "CAP ALUM 100UF 20% 10V SMD", Case/Package=Radial, LCSC Part Number=C340720, Leakage Current=10uA, Manufacturer=Nichicon, Max Operating Temperature=105°C, Min Operating Temperature=-55°C, Package Quantity=1000, Ripple Current=240mA, Supplier Part Number 1=493-14563-1-ND, Tolerance=20%, Voltage=10V, Capacitance=100uF, Category="Aluminum Electrolytic Capacitors", ComponentLink1Description=https://datasheet.ciiva.com/11776/0900766b80ebdadd-11776792.pdf?src-supplier=RSComponents, ComponentLink1URL=https://datasheet.ciiva.com/11776/0900766b80ebdadd-11776792.pdf?src-supplier=RSComponents, ComponentLink2Description=https://datasheet.ciiva.com/111/e-cd-111628.pdf?src-supplier=Digi-Key, ComponentLink2URL=https://datasheet.ciiva.com/111/e-cd-111628.pdf?src-supplier=Digi-Key, ComponentLink3Description=https://datasheet.ciiva.com/11686/e-cd-11686168.pdf?src-supplier=Avnet, ComponentLink3URL=https://datasheet.ciiva.com/11686/e-cd-11686168.pdf?src-supplier=Avnet, Construction=Cylindrical, Diameter=6.3mm, Dissipation Factor=0.19%, Height=5.8mm, Height - Seated (Max)=0.24inch, Impedance=360mR, Item Type=Capacitor, Length=5.8mm, Life (Hours)=2000Hour, Manufacturer Part Number=UCD1A101MCL1GS, Mount="Surface Mount", Packaging="Tape and Reel", Polarity=Polar, Pricing 1="1=0.51000, 10=0.35900, 50=0.27160, 100=0.23660, 500=0.17526 (USD)", Radiation Hardening=No, RoHS=Yes, RoHS Compliant=Yes, Series=CD, Stock 1=6029, Supplier 1=Digi-Key, Termination=SMD/SMT, Voltage Rating=10V, Voltage Rating (DC)=10V
C17_Relay0 C17_Relay1 C17_Relay2 C17_Relay3 C17_Relay4 C17_Relay5 C17_Relay6: library part 1206B224K500NT, "50V 220nF X7R ±10% 1206 Multilayer Ceramic Capacitors MLCC - SMD/SMT ROHS", LCSC Part Number=C1857, Manufacturer=FH, Package=1206, ComponentLink1Description=LCSC, ComponentLink1URL=https://www.lcsc.com/product-detail/Multilayer-Ceramic-Capacitors-MLCC-SMD-SMT_FH-Guangdong-Fenghua-Advanced-Tech-1206B224K500NT_C1857.html, Item Type=Capacitor, Manufacturer Part Number=1206B224K500NT
C18: library part CC0402KRX5R8BB105, "CAP CER 1UF 25V X5R 0402", Case Code (Imperial)=0402, Case Code (Metric)=1005, Dielectric=X5R, LCSC Part Number=C326568, Manufacturer=Yageo, Max Operating Temperature=85°C, Min Operating Temperature=-55°C, Package Quantity=10000, Supplier Part Number 1=603-CC402KRX5R8BB105, Tolerance=10%, Voltage Rating=25V, Capacitance=1uF, Case/Package=0402, Category="Ceramic Capacitors", ComponentLink1Description=http://www.mouser.com/ds/2/447/Yageo_UPY-GP_NP0_16V-to-50V_9-358835.pdf?src-supplier=Mouser, ComponentLink1URL=http://www.mouser.com/ds/2/447/Yageo_UPY-GP_NP0_16V-to-50V_9-358835.pdf?src-supplier=Mouser, ComponentLink2Description=http://www.yageo.com/documents/recent/UPY-GPHC_X5R_4V-to-50V_25.pdf?src-supplier=Digi-Key, ComponentLink2URL=http://www.yageo.com/documents/recent/UPY-GPHC_X5R_4V-to-50V_25.pdf?src-supplier=Digi-Key, ComponentLink3Description=https://4donline.ihs.com/images/VipMasterIC/IC/YAGO/YAGO-S-A0006851646/YAGO-S-A0006851646-1.pdf?hkey=6D3A4C79FDBF58556ACFDE234799DDF0&src-supplier=Newark, ComponentLink3URL=https://4donline.ihs.com/images/VipMasterIC/IC/YAGO/YAGO-S-A0006851646/YAGO-S-A0006851646-1.pdf?hkey=6D3A4C79FDBF58556ACFDE234799DDF0&src-supplier=Newark, Halogen Free="Halogen Free", Lead Free="Lead Free", Length=0.039inch, Manufacturer Part Number=CC0402KRX5R8BB105, Mount="Surface Mount", Packaging="Tape and Reel", Pricing 1="1=0.30000, 10=0.20400, 50=0.20400, 100=0.11600, 1000=0.07200, 10000=0.05900 (USD)", RoHS=Yes, RoHS Compliant=Yes, Stock 1=91975, Supplier 1=Mouser, Termination=SMD/SMT, Thickness=0.022inch, Voltage Rating (DC)=25V, Weight=2.3E-05oz, Width=0.02inch
C19: library part CC0603MRX5R5BB226, "CAP CER 22UF 6.3V X5R 0603", Case Code (Imperial)=0603, Case Code (Metric)=1608, Dielectric=X5R, LCSC Part Number=C109448, Manufacturer=Yageo, Max Operating Temperature=85°C, Min Operating Temperature=-55°C, Package Quantity=4000, Resistor Type=Ceramic, Supplier Part Number 1=603-CC603MRX5R5BB226, Tolerance=20%, Voltage Rating=6.3V, Capacitance=22uF, Case/Package=0603, Category="Ceramic Capacitors", ComponentLink1Description=http://www.mouser.com/ds/2/447/Yageo_UPY-GP_NP0_16V-to-50V_9-358835.pdf?src-supplier=Mouser, ComponentLink1URL=http://www.mouser.com/ds/2/447/Yageo_UPY-GP_NP0_16V-to-50V_9-358835.pdf?src-supplier=Mouser, ComponentLink2Description=http://www.yageo.com/documents/recent/UPY-GPHC_X5R_4V-to-50V_25.pdf?src-supplier=Digi-Key, ComponentLink2URL=http://www.yageo.com/documents/recent/UPY-GPHC_X5R_4V-to-50V_25.pdf?src-supplier=Digi-Key, Depth=0.8mm, Halogen Free="Halogen Free", Lead Free="Lead Free", Length=0.063inch, Manufacturer Part Number=CC0603MRX5R5BB226, Mount="Surface Mount", Packaging="Tape and Reel", Pricing 1="1=0.33000, 10=0.22500, 50=0.22500, 100=0.12800, 1000=0.07900, 10000=0.06500 (USD)", RoHS=Yes, RoHS Compliant=Yes, Stock 1=3030, Supplier 1=Mouser, Termination=SMD/SMT, Thickness=0.035inch, Voltage Rating (DC)=6.3V, Weight=7.1E-05oz, Width=0.031inch
D1: "ESD Suppressor TVS 5.5V 4-Pin(3+Tab) SOT-143 T/R", Breakdown Voltage=5.5V, Capacitance=30pF, Case/Package=SOT-143, Clamping Voltage=7.8V, Clamping Voltage-Max=8V, LCSC Part Number=C3029025, Leakage Current=100nA, Manufacturer=Littelfuse, Max Operating Temperature=85°C, Max Power Dissipation=225mW, Min Operating Temperature=-40°C, Power Line Protection=No, Resistor Type=Zener, Supplier Part Number 1=F2715CT-ND, Voltage Rating (DC)=5V, Category=Diodes, ComponentLink1Description=https://datasheet.ciiva.com/15143/getdatasheetpartid-116020-15143550.pdf?src-supplier=Verical, ComponentLink1URL=https://datasheet.ciiva.com/15143/getdatasheetpartid-116020-15143550.pdf?src-supplier=Verical, ComponentLink2Description=https://datasheet.ciiva.com/332/sp05xxba-332550.pdf?src-supplier=Digi-Key, ComponentLink2URL=https://datasheet.ciiva.com/332/sp05xxba-332550.pdf?src-supplier=Digi-Key, ComponentLink3Description=https://datasheet.ciiva.com/8062/littefuse-spa-sp050x-8062422.pdf?src-supplier=Element14, ComponentLink3URL=https://datasheet.ciiva.com/8062/littefuse-spa-sp050x-8062422.pdf?src-supplier=Element14, ComponentLink4Description=https://datasheet.ciiva.com/22697/1911798-22697942.pdf?src-supplier=Element14, ComponentLink4URL=https://datasheet.ciiva.com/22697/1911798-22697942.pdf?src-supplier=Element14, ComponentLink5Description=https://datasheet.ciiva.com/332/sp05xxba-332551.pdf?src-supplier=Digi-Key, ComponentLink5URL=https://datasheet.ciiva.com/332/sp05xxba-332551.pdf?src-supplier=Digi-Key, ComponentLink6Description=https://datasheet.ciiva.com/16449/sp05xxba-16449463.pdf?src-supplier=Future+Electronics, ComponentLink6URL=https://datasheet.ciiva.com/16449/sp05xxba-16449463.pdf?src-supplier=Future+Electronics, ComponentLink7Description=https://datasheet.ciiva.com/332/sp05xxba-332552.pdf?src-supplier=Digi-Key, ComponentLink7URL=https://datasheet.ciiva.com/332/sp05xxba-332552.pdf?src-supplier=Digi-Key, ComponentLink8Description=https://datasheet.ciiva.com/4509/sp05x-leadfree-4509162.pdf?src-supplier=Mouser, ComponentLink8URL=https://datasheet.ciiva.com/4509/sp05x-leadfree-4509162.pdf?src-supplier=Mouser, ComponentLink9Description=https://datasheet.ciiva.com/7650/526672-7650894.pdf?src-supplier=Element14, ComponentLink9URL=https://datasheet.ciiva.com/7650/526672-7650894.pdf?src-supplier=Element14, Depth=1.4mm, Diode Type=Avalanche, Direction=Unidirectional, Element Configuration="Common Anode", ESD Protection=Yes, Height=1.05mm, Lead Free="Lead Free", Length=3.04mm, Manufacturer Part Number=SP0503BAHTG, Max Reverse Leakage Current=100nA, Mount="Surface Mount", Number of Channels=3, Number of Elements=3, Number of Pins=4, Number of Unidirectional Channels=3, Operating Supply Voltage=5.5V, Packaging="Tape and Reel", Peak Pulse Power=225mW, Polarity=Bidirectional,Unidirectional, Power Dissipation=225mW, Pricing 1="1=0.92000, 10=0.81200, 100=0.62260, 500=0.49214, 1000=0.39371 (USD)", Radiation Hardening=No, REACH SVHC="No SVHC", Reverse Standoff Voltage=5.5V, RoHS=Yes, RoHS Compliant=Yes, Series="SP05, SPA®", Stock 1=651, Supplier 1=Digi-Key, Termination=SMD/SMT, Width=1.4mm, Working Voltage=5.5V
F1: "6V 1A 100A 1.95A 300ms 0805 Resettable Fuses ROHS", LCSC Part Number=C369152, Manufacturer="Jinrui Electronic Materials Co.", Package=0805, ComponentLink1Description=LCSC, ComponentLink1URL=https://www.lcsc.com/product-detail/Resettable-Fuses_Jinrui-Electronic-Materials-Co-JK-SMD0805-100_C369152.html, Item Type=Fuse, Manufacturer Part Number=JK-SMD0805-100
FB1: "FERRITE BEAD 120 OHM 0603 1LN", Case Code (Imperial)=0603, Case Code (Metric)=1608, Current Rating=3A, DC Resistance (DCR)=25mR, Frequency=100MHz, LCSC Part Number=C113030, Manufacturer=Murata, Max Operating Temperature=125°C, Min Operating Temperature=-55°C, Package Quantity=1, Tolerance=25%, Case/Package=0603, Category="Ferrite Beads and Chips", ComponentLink1Description=https://datasheet.ciiva.com/1012/l0110s0100blm18s-1012624.pdf?src-supplier=Digi-Key, ComponentLink1URL=https://datasheet.ciiva.com/1012/l0110s0100blm18s-1012624.pdf?src-supplier=Digi-Key, ComponentLink2Description=https://datasheet.ciiva.com/11799/0900766b811b5866-11799181.pdf?src-supplier=RSComponents, ComponentLink2URL=https://datasheet.ciiva.com/11799/0900766b811b5866-11799181.pdf?src-supplier=RSComponents, ComponentLink3Description=https://datasheet.ciiva.com/18093/getdatasheetpartid-295885-18093249.pdf?src-supplier=Verical, ComponentLink3URL=https://datasheet.ciiva.com/18093/getdatasheetpartid-295885-18093249.pdf?src-supplier=Verical, ComponentLink4Description=https://datasheet.ciiva.com/41449/001171723-da-01-en-chip-drossel0603-120r-3000ma-1-6x0-8mm-41449353.pdf?src-supplier=Conrad, ComponentLink4URL=https://datasheet.ciiva.com/41449/001171723-da-01-en-chip-drossel0603-120r-3000ma-1-6x0-8mm-41449353.pdf?src-supplier=Conrad, ComponentLink5Description=https://datasheet.ciiva.com/41449/001172312-da-01-en-drossel-0603-120r-1-6x0-8mm-10000st-41449675.pdf?src-supplier=Conrad, ComponentLink5URL=https://datasheet.ciiva.com/41449/001172312-da-01-en-drossel-0603-120r-1-6x0-8mm-10000st-41449675.pdf?src-supplier=Conrad, ComponentLink6Description=https://datasheet.ciiva.com/8021/5151-8021511.pdf?src-supplier=Element14, ComponentLink6URL=https://datasheet.ciiva.com/8021/5151-8021511.pdf?src-supplier=Element14, ComponentLink7Description=https://datasheet.ciiva.com/8021/5151-8021512.pdf?src-supplier=Element14, ComponentLink7URL=https://datasheet.ciiva.com/8021/5151-8021512.pdf?src-supplier=Element14, ComponentLink8Description=https://datasheet.ciiva.com/14122/blm-series-eng-tds-14122906.pdf?src-supplier=Distrelec, ComponentLink8URL=https://datasheet.ciiva.com/14122/blm-series-eng-tds-14122906.pdf?src-supplier=Distrelec, ComponentLink9Description=https://datasheet.ciiva.com/1012/l0110s0100blm18s-1012623.pdf?src-supplier=Digi-Key, ComponentLink9URL=https://datasheet.ciiva.com/1012/l0110s0100blm18s-1012623.pdf?src-supplier=Digi-Key, ComponentLink10Description=https://datasheet.ciiva.com/1012/l0110s0100blm18s-1012625.pdf?src-supplier=Digi-Key, ComponentLink10URL=https://datasheet.ciiva.com/1012/l0110s0100blm18s-1012625.pdf?src-supplier=Digi-Key, ComponentLink11Description=https://datasheet.ciiva.com/16395/l0110s0100blm18s-16395498.pdf?src-supplier=Future+Electronics, ComponentLink11URL=https://datasheet.ciiva.com/16395/l0110s0100blm18s-16395498.pdf?src-supplier=Future+Electronics, Core Material=Ferrite, DC Resistance-Max=25mR, Depth=0.8mm, Height=0.8mm, Impedance=120R, Item Type="Ferrite Bead", Lead Free="Lead Free", Length=1.6mm, Manufacturer Part Number=BLM18SG121TN1D, Material=Steel,Ferrite, Max Current Rating=3A, Max DC Current=3A, Number of Circuits=1, Number of Lines=1, Number of Pins=2, Packaging="Tape and Reel", Pricing 1="1=0.12640, 10=0.08350, 25=0.07210, 100=0.05150, 250=0.04730, 500=0.04110, 1000=0.03420, 3000=0.03360, 6000=0.03320, 15000=0.03270, 30000=0.03200, 75000=0.03150 (USD)", Reach SVHC Compliant=Yes, RoHS=Yes, RoHS Compliant=Yes, Series=BLM18S, Shielding=Unshielded, Stock 1=82612, Supplier 1="Arrow Electronics", Supplier Part Number 1=BLM18SG121TN1D, Termination=SMD/SMT, Test Frequency=100MHz, Width=0.8mm
J1: "250mA 1 16 Female Type-C SMD USB Connectors ROHS", LCSC Part Number=C165948, Manufacturer="Korean Hroparts Elec", ComponentLink1Description=LCSC, ComponentLink1URL=https://www.lcsc.com/product-detail/USB-Connectors_Korean-Hroparts-Elec-TYPE-C-31-M-12_C165948.html, Manufacturer Part Number=TYPE-C-31-M-12
J2: library part C145963, "1x6P SH 1 1mm 6 SMD,P=1mm Wire To Board / Wire To Wire Connector ROHS", Manufacturer=BOOMELE, Package=SMD,P=1mm, ComponentLink1Description=LCSC, ComponentLink1URL=https://www.lcsc.com/product-detail/Wire-To-Board-Wire-To-Wire-Connector_BOOMELE-Boom-Precision-Elec-C145963_C145963.html, Item Type=Connector, LCSC Part Number=C145963, Manufacturer Part Number=C145963
J3: "SMD,P=1.25mm Wire To Board / Wire To Wire Connector ROHS", LCSC Part Number=C5140428, Manufacturer=DEALON, Package=SMD,P=1.25mm, ComponentLink1Description=LCSC, ComponentLink1URL=https://www.lcsc.com/product-detail/Wire-To-Board-Wire-To-Wire-Connector_DEALON-1-25-11PWB_C5140428.html, Item Type="Wire To Board Connector", Manufacturer Part Number=1.25-11PWB
J4 J5: "PinHeader_1x05_P5.00mm_Vertical"
K1_Relay0 K1_Relay1 K1_Relay2 K1_Relay3 K1_Relay4 K1_Relay5 K1_Relay6: "Relay Gen Purpose DPDT 1A 3VDC", Coil Current=46.7mA, Coil Power=140mW, Coil Resistance=64.3R, Coil Voltage (DC)=3V, Contact Current Rating=1A, LCSC Part Number=C1560650, Manufacturer=KEMET, Max Operating Temperature=85°C, Min Operating Temperature=-40°C, Package Quantity=3600, Supplier Part Number 1=80-EA2-3TNU, Category=Uncategorized, Coil Type="Latching, Dual Coil", ComponentLink1Description=https://api.kemet.com/component-edge/download/datasheet/EA2-3TNU.pdf?src-supplier=Digi-Key, ComponentLink1URL=https://api.kemet.com/component-edge/download/datasheet/EA2-3TNU.pdf?src-supplier=Digi-Key, Contact Material=Gold,Silver, Item Type=Relay, Manufacturer Part Number=EA2-3TNU, Mount="Through Hole", Operate Time=2ms, Packaging=Rail/Tube, Pricing 1="1=3.85000, 10=3.11000, 50=3.11000, 100=2.42000, 250=2.00000, 500=1.85000, 1000=1.85000, 3600=1.58000, 10000=1.58000 (USD)", Relay Type="General Purpose", Release Time=1ms, RoHS=No, RoHS Compliant=No, Stock 1=873, Supplier 1=Mouser, Termination="PC Pin", Throw Configuration=DPDT
P1 P2 P3 P4 P5 P6 P7 P8 P9 P10 P11 P12 P13: "Test Point ON"
Q1: "TRANS NPN 40V 0.6A SMD SOT23-3", Case/Package=SOT-23, Collector Base Voltage (VCBO)=75V, Collector Emitter Breakdown Voltage=40V, Collector Emitter Saturation Voltage=1V, Continuous Collector Current=600mA, Current=1A, Emitter Base Voltage (VEBO)=6V, Frequency=300MHz, LCSC Part Number=C94515, Manufacturer=Diodes, Max Operating Temperature=150°C, Max Power Dissipation=300mW, Min Operating Temperature=-55°C, Package Quantity=3000, Power Dissipation=350mW, Supplier Part Number 1=MMBT2222A-FDIDKR-ND, Collector Emitter Voltage (VCEO)=40V, ComponentLink1Description=http://www.diodes.com/datasheets/ds30041.pdf?src-supplier=Future+Electronics, ComponentLink1URL=http://www.diodes.com/datasheets/ds30041.pdf?src-supplier=Future+Electronics, ComponentLink2Description=http://www.diodes.com/datasheets/ds30041.pdf?src-supplier=Avnet, ComponentLink2URL=http://www.diodes.com/datasheets/ds30041.pdf?src-supplier=Avnet, ComponentLink3Description=https://www.verical.com/server-webapp/html/getDatasheet?partID=82692&src-supplier=Verical, ComponentLink3URL=https://www.verical.com/server-webapp/html/getDatasheet?partID=82692&src-supplier=Verical, ComponentLink4Description=https://www.diodes.com/assets/Datasheets/ds30041.pdf?src-supplier=Digi-Key, ComponentLink4URL=https://www.diodes.com/assets/Datasheets/ds30041.pdf?src-supplier=Digi-Key, ComponentLink5Description=http://www.diodes.com/datasheets/ds30041.pdf?src-supplier=Avnet+Europe, ComponentLink5URL=http://www.diodes.com/datasheets/ds30041.pdf?src-supplier=Avnet+Europe, ComponentLink6Description=http://www.diodes.com/datasheets/ds30041.pdf?src-supplier=Element14, ComponentLink6URL=http://www.diodes.com/datasheets/ds30041.pdf?src-supplier=Element14, Contact Plating=Matte,Tin, Current Rating=600mA, Element Configuration=Single, Gain Bandwidth Product=300MHz, Height=1mm, hFE Min=100, Item Type=Mosfet, Lead Free="Lead Free", Length=3.05mm, Manufacturer Part Number=MMBT2222A-7-F, Max Breakdown Voltage=40V, Max Collector Current=600mA, Max Frequency=300MHz, Mount="Surface Mount", Number of Elements=1, Number of Pins=3, Packaging="Tape and Reel", Polarity=NPN, Pricing 1="1=0.15, 10=0.134, 100=0.0729, 500=0.04486, 1000=0.03059 (USD)", Radiation Hardening=No, REACH SVHC="No SVHC", Stock 1=2471182, Supplier 1=Digi-Key, Termination=SMD/SMT, Transition Frequency=300MHz, Voltage=40V, Voltage Rating (DC)=40V, Weight=0.000282oz, Width=1.4mm
R1: library part RC1206FR-071ML, "RES 1M OHM 1% 1/4W 1206", Case Code (Imperial)=1206, Case Code (Metric)=3216, LCSC Part Number=C108083, Manufacturer=Yageo, Max Operating Temperature=155°C, Max Power Dissipation=250mW, Min Operating Temperature=-55°C, Package Quantity=5000, Resistance=1MR, Resistance Tolerance=1%, Resistor Type="Thick Film", Temperature Coefficient=100ppm/°C, Voltage Rating=200V, Case/Package=1206, Category="Chip SMD Resistors", ComponentLink1Description=https://datasheet.ciiva.com/11819/0900766b80c6630a-11819912.pdf?src-supplier=RSComponents, ComponentLink1URL=https://datasheet.ciiva.com/11819/0900766b80c6630a-11819912.pdf?src-supplier=RSComponents, ComponentLink2Description=https://datasheet.ciiva.com/46445/444357-46445709.pdf?src-supplier=Element14, ComponentLink2URL=https://datasheet.ciiva.com/46445/444357-46445709.pdf?src-supplier=Element14, ComponentLink3Description=https://datasheet.ciiva.com/7857/444357-7857289.pdf?src-supplier=Element14, ComponentLink3URL=https://datasheet.ciiva.com/7857/444357-7857289.pdf?src-supplier=Element14, ComponentLink4Description=https://datasheet.ciiva.com/7857/444357-7857288.pdf?src-supplier=Element14, ComponentLink4URL=https://datasheet.ciiva.com/7857/444357-7857288.pdf?src-supplier=Element14, ComponentLink5Description=https://datasheet.ciiva.com/17033/pyu-rc1206-51-rohs-l-4-17033611.pdf?src-supplier=Future+Electronics, ComponentLink5URL=https://datasheet.ciiva.com/17033/pyu-rc1206-51-rohs-l-4-17033611.pdf?src-supplier=Future+Electronics, Construction=Rectangular, Depth=1.6mm, Features="Moisture Resistant", Height=0.55mm, Item Type=Resistor, Lead Free="Lead Free", Length=3.1mm, Manufacturer Part Number=RC1206FR-071ML, Military Standard=Not, Number of Terminations=2, Packaging="Tape and Reel", Power Rating=250mW, Pricing 1="5000=0.00412, 10000=0.00406, 20000=0.00394 (USD)", RoHS=Yes, RoHS Compliant=Yes, Series=RC, Size Code=1206, Stock 1=935000, Supplier 1=Avnet, Supplier Part Number 1=RC1206FR-071ML, Technology="THICK FILM", Termination=SMD/SMT, Tolerance=1%, Width=1.6mm
R2 R3: library part RC0402FR-075K1L, "RES 5.1K OHM 1% 1/16W 0402", Case Code (Imperial)=0402, Case Code (Metric)=1005, LCSC Part Number=C137973, Manufacturer=Yageo, Max Operating Temperature=155°C, Max Power Dissipation=63mW, Min Operating Temperature=-55°C, Package Quantity=1, Resistance=5.1kR, Resistance Tolerance=1%, Resistor Type="Thick Film", Temperature Coefficient=100ppm/°C, Voltage Rating=50V, Case/Package=0402, Category="Chip SMD Resistors", ComponentLink1Description=https://datasheet.ciiva.com/7983/1018594-7983519.pdf?src-supplier=Element14, ComponentLink1URL=https://datasheet.ciiva.com/7983/1018594-7983519.pdf?src-supplier=Element14, ComponentLink2Description=https://datasheet.ciiva.com/46394/1018594-46394936.pdf?src-supplier=Element14, ComponentLink2URL=https://datasheet.ciiva.com/46394/1018594-46394936.pdf?src-supplier=Element14, ComponentLink3Description=https://datasheet.ciiva.com/2453/pyu-r-int-thick-7-2453401.pdf?src-supplier=Digi-Key, ComponentLink3URL=https://datasheet.ciiva.com/2453/pyu-r-int-thick-7-2453401.pdf?src-supplier=Digi-Key, ComponentLink4Description=https://datasheet.ciiva.com/2453/pyu-r-int-thick-7-2453402.pdf?src-supplier=Digi-Key, ComponentLink4URL=https://datasheet.ciiva.com/2453/pyu-r-int-thick-7-2453402.pdf?src-supplier=Digi-Key, ComponentLink5Description=https://datasheet.ciiva.com/2453/pyu-r-int-thick-7-2453400.pdf?src-supplier=Digi-Key, ComponentLink5URL=https://datasheet.ciiva.com/2453/pyu-r-int-thick-7-2453400.pdf?src-supplier=Digi-Key, ComponentLink6Description=https://datasheet.ciiva.com/12558/pyu-rc0402-51-rohs-l-6-r-8721-12558460.pdf?src-supplier=Mouser, ComponentLink6URL=https://datasheet.ciiva.com/12558/pyu-rc0402-51-rohs-l-6-r-8721-12558460.pdf?src-supplier=Mouser, ComponentLink7Description=https://datasheet.ciiva.com/16744/pyu-rc0402-51-rohs-l-6-r-16744283.pdf?src-supplier=Future+Electronics, ComponentLink7URL=https://datasheet.ciiva.com/16744/pyu-rc0402-51-rohs-l-6-r-16744283.pdf?src-supplier=Future+Electronics, ComponentLink8Description=https://datasheet.ciiva.com/15189/getdatasheetpartid-323636-15189493.pdf?src-supplier=Verical, ComponentLink8URL=https://datasheet.ciiva.com/15189/getdatasheetpartid-323636-15189493.pdf?src-supplier=Verical, Construction=Rectangular, Depth=0.5mm, Features="Moisture Resistant", Height=0.016inch, Item Type=0402, Lead Free="Lead Free", Length=1mm, Manufacturer Part Number=RC0402FR-075K1L, Military Standard=Not, Number of Terminations=2, Packaging="Tape and Reel", Power Rating=63mW, Pricing 1="10000=0.00085 (USD)", RoHS=Yes, RoHS Compliant=Yes, Series=RC, Stock 1=65000, Supplier 1=Avnet, Supplier Part Number 1=RC0402FR-075K1L, Technology="THICK FILM", Termination=SMD/SMT, Tolerance=1%, Voltage Rating (DC)=50V, Width=0.02inch, Working Voltage=50V
R4 R5 R6 R7 R8 R9 R10 R14 R19: library part RC0402FR-07220KL, "RES 220K OHM 1% 1/16W 0402", Case Code (Imperial)=0402, Case Code (Metric)=1005, Manufacturer=Yageo, Max Operating Temperature=155°C, Max Power Dissipation=63mW, Min Operating Temperature=-55°C, Package Quantity=1, Power Rating=62.5mW, Resistance=220kR, Resistance Tolerance=1%, Resistor Type="Thick Film", Supplier Part Number 1=311-220KLRCT-ND, Temperature Coefficient=100ppm/°C, Voltage Rating=50V, Case/Package=0402, Category="Chip SMD Resistors", ComponentLink1Description=https://datasheet.ciiva.com/11808/0900766b80c66297-11808792.pdf?src-supplier=RSComponents, ComponentLink1URL=https://datasheet.ciiva.com/11808/0900766b80c66297-11808792.pdf?src-supplier=RSComponents, ComponentLink2Description=https://datasheet.ciiva.com/5924/1018594-5924944.pdf?src-supplier=Farnell, ComponentLink2URL=https://datasheet.ciiva.com/5924/1018594-5924944.pdf?src-supplier=Farnell, ComponentLink3Description=https://datasheet.ciiva.com/2453/pyu-r-int-thick-7-2453533.pdf?src-supplier=Digi-Key, ComponentLink3URL=https://datasheet.ciiva.com/2453/pyu-r-int-thick-7-2453533.pdf?src-supplier=Digi-Key, ComponentLink4Description=https://datasheet.ciiva.com/2453/pyu-r-int-thick-7-2453534.pdf?src-supplier=Digi-Key, ComponentLink4URL=https://datasheet.ciiva.com/2453/pyu-r-int-thick-7-2453534.pdf?src-supplier=Digi-Key, ComponentLink5Description=https://datasheet.ciiva.com/2453/pyu-r-int-thick-7-2453532.pdf?src-supplier=Digi-Key, ComponentLink5URL=https://datasheet.ciiva.com/2453/pyu-r-int-thick-7-2453532.pdf?src-supplier=Digi-Key, ComponentLink6Description=https://datasheet.ciiva.com/12577/pyu-rc0402-51-rohs-l-6-r-12577270.pdf?src-supplier=Mouser, ComponentLink6URL=https://datasheet.ciiva.com/12577/pyu-rc0402-51-rohs-l-6-r-12577270.pdf?src-supplier=Mouser, Construction=Rectangular, Depth=0.5mm, Features="Moisture Resistant", Height=0.016inch, Lead Free="Lead Free", Length=1mm, Manufacturer Part Number=RC0402FR-07220KL, Military Standard=Not, Number of Terminations=2, Packaging="Tape and Reel", Pricing 1="1=0.10000, 10=0.01400, 100=0.00580, 1000=0.00262, 2500=0.00228, 5000=0.00188 (USD)", Reach SVHC Compliant=Yes, RoHS=Yes, RoHS Compliant=Yes, Series=RC, Size Code=0402, Stock 1=1192792, Supplier 1=Digi-Key, Technology="THICK FILM", Termination=SMD/SMT, Tolerance=1%, Weight=2.3E-05oz, Width=0.02inch